# Altium PCB BMS042A_PCB.PcbDoc (part 1 of 5)
Units mil, origin at the board's own origin, x right, y up, seen from the top; angles counter-clockwise.
Board outline 4409.45 x 3307 mil, 6 copper layers (Top Layer, Layer 2 - PGND, Layer 3, Layer 4, Layer 5 - PGND, Bottom Layer), stack 60.8 mil thick; 273 components, 77 nets, 544 pads, 927 vias.
Unrouted connection lines stored in the file: 219.
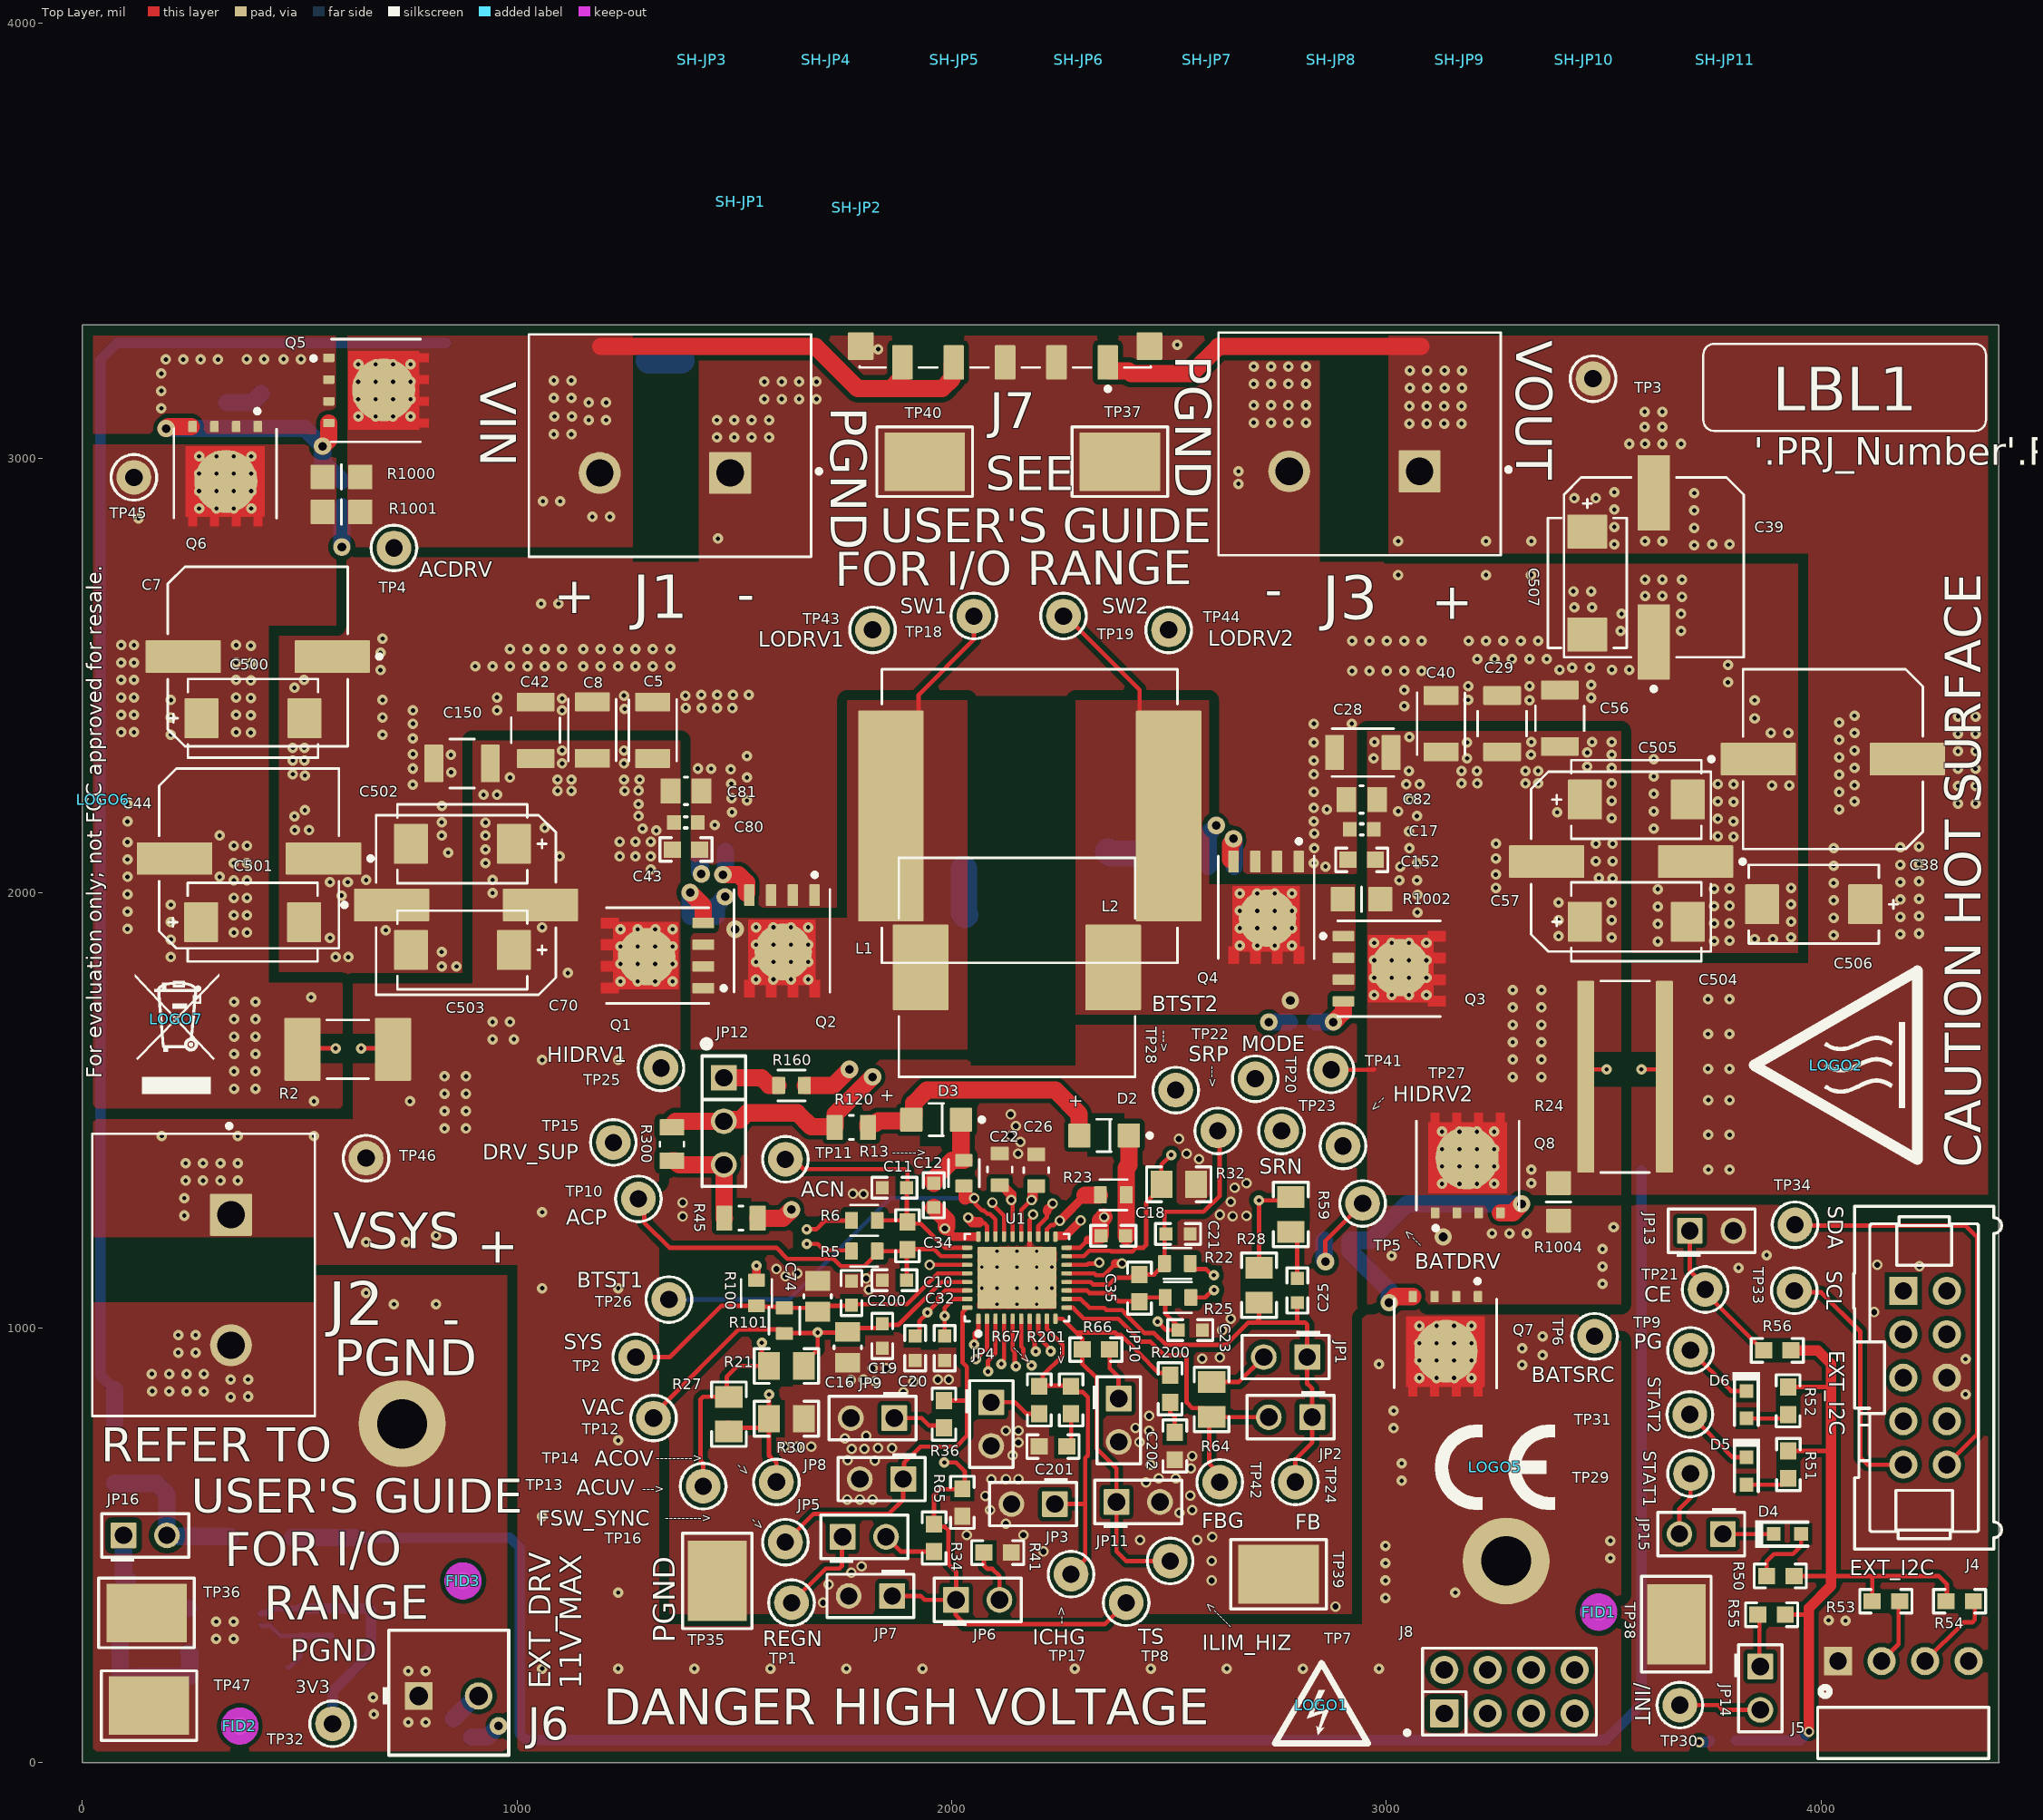
[diagram p0: Top Layer view]
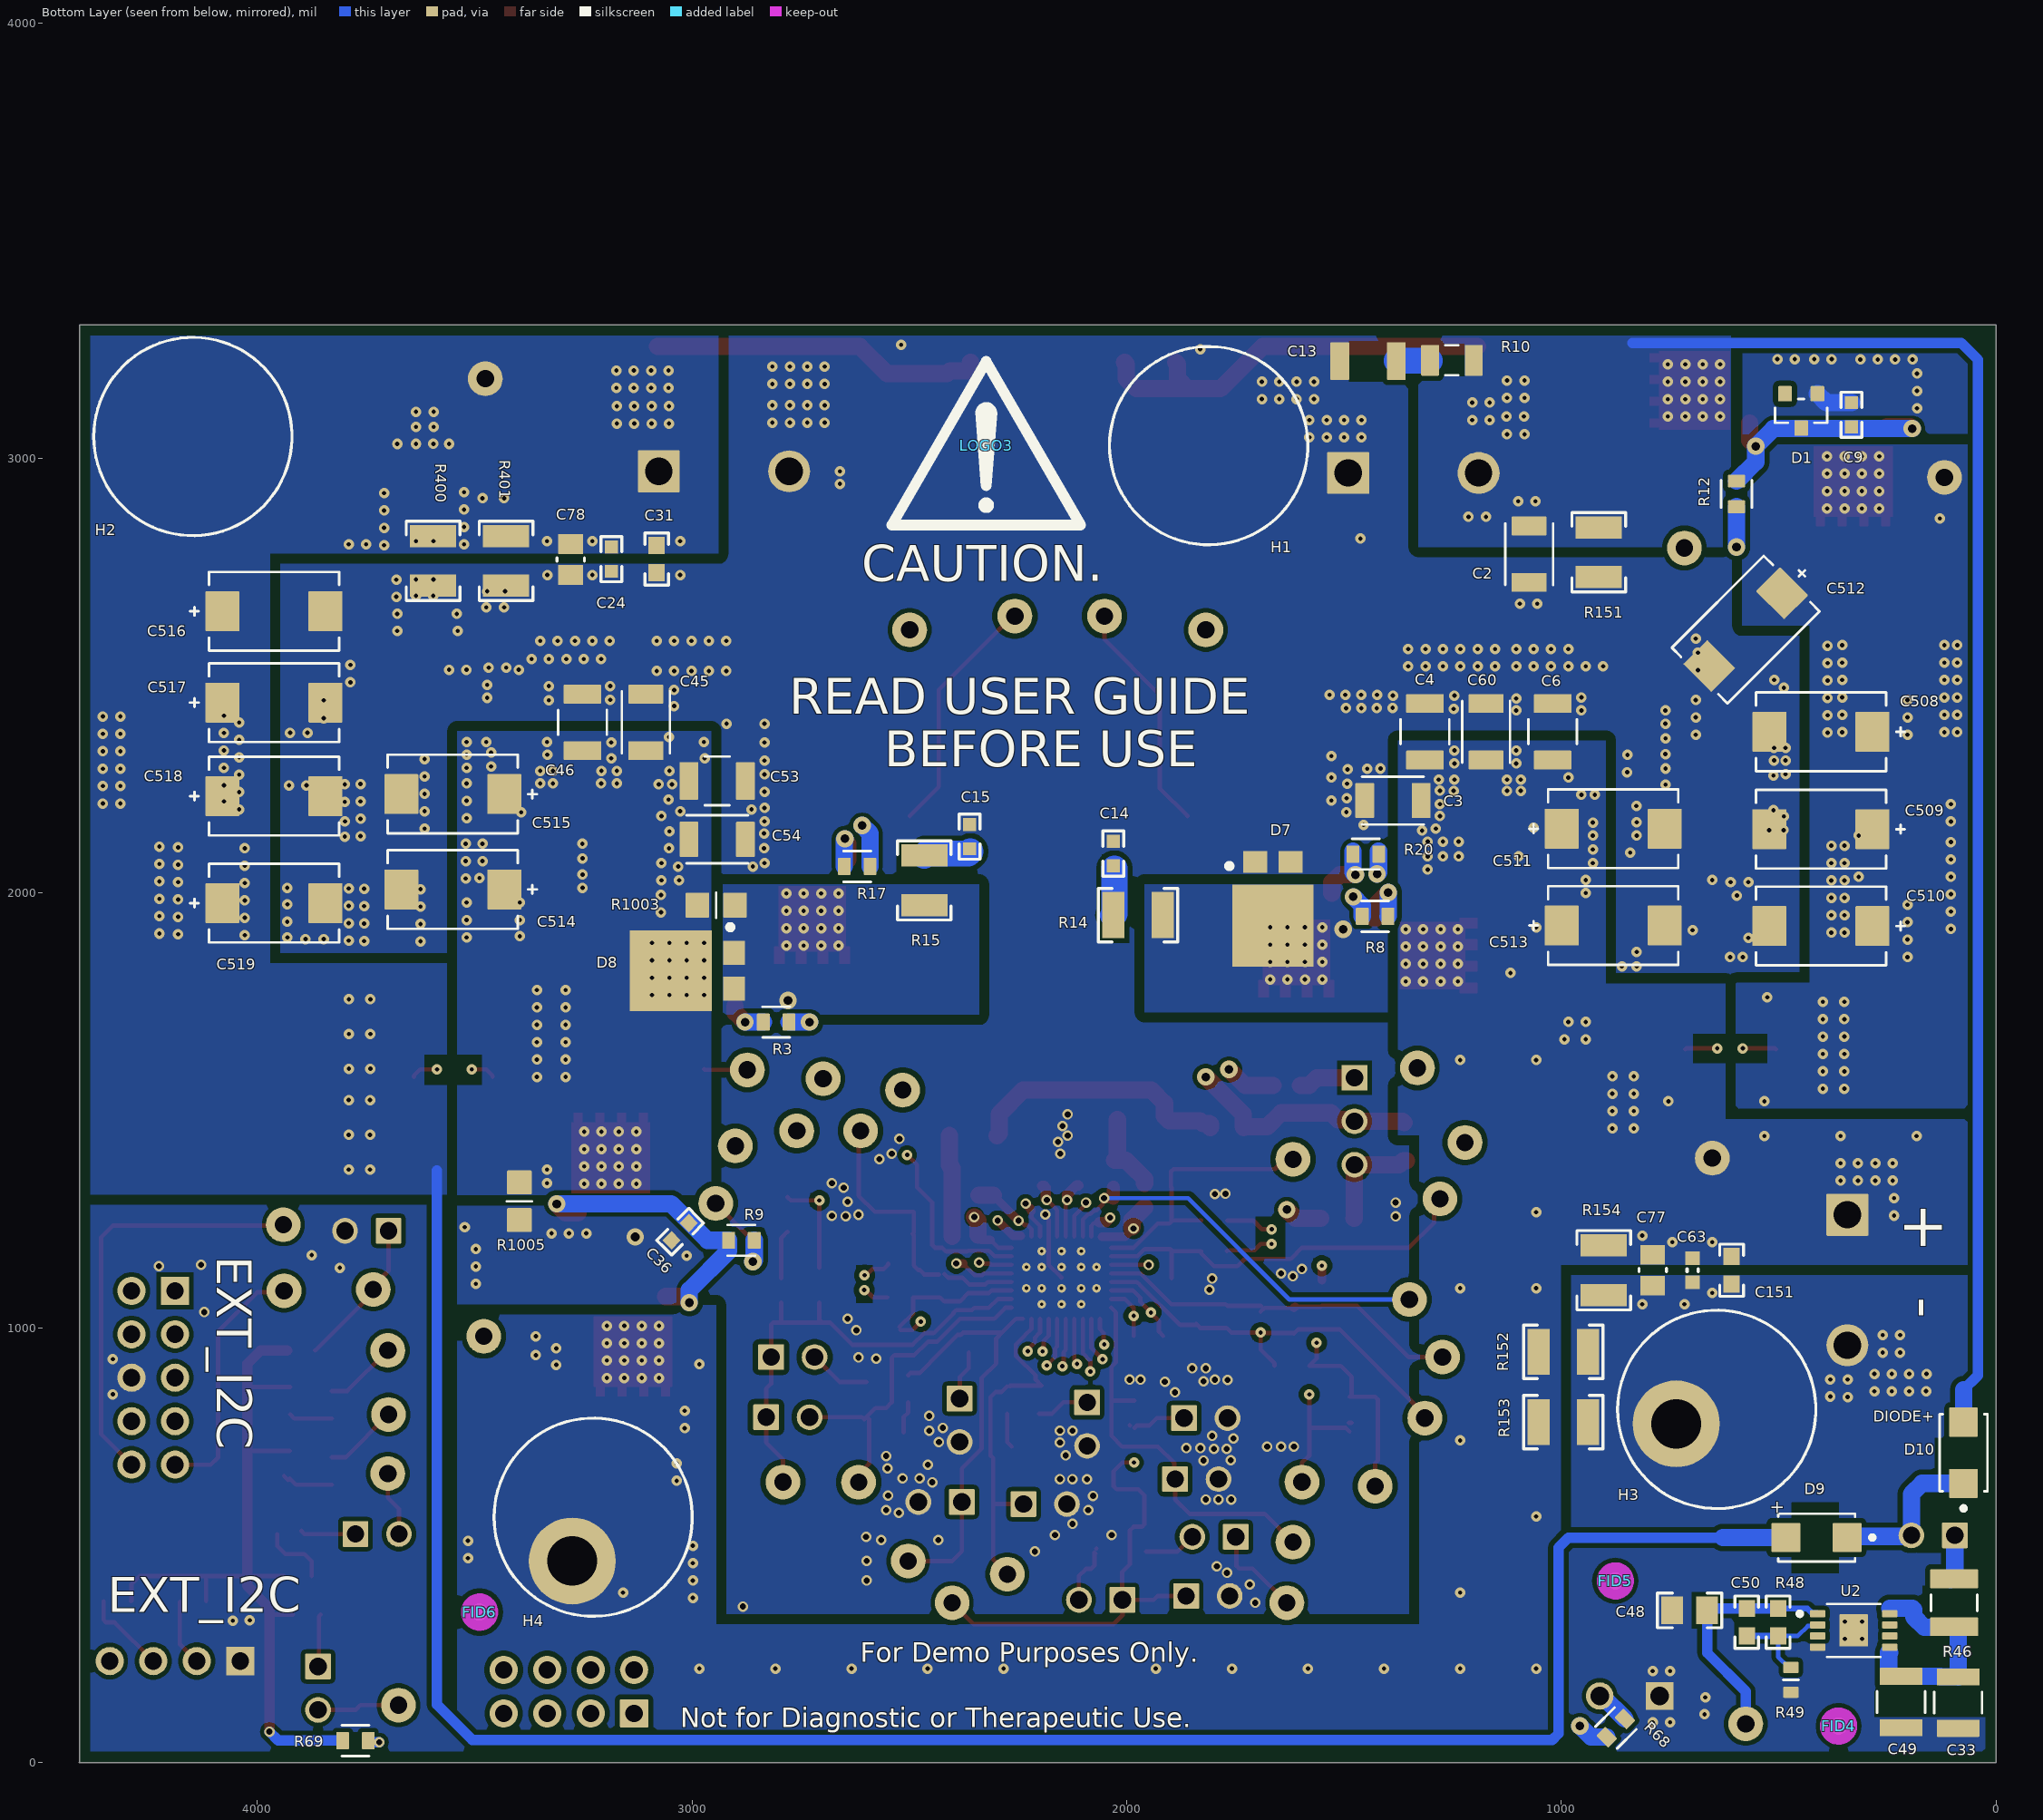
[diagram p1: Bottom Layer view, seen from below]
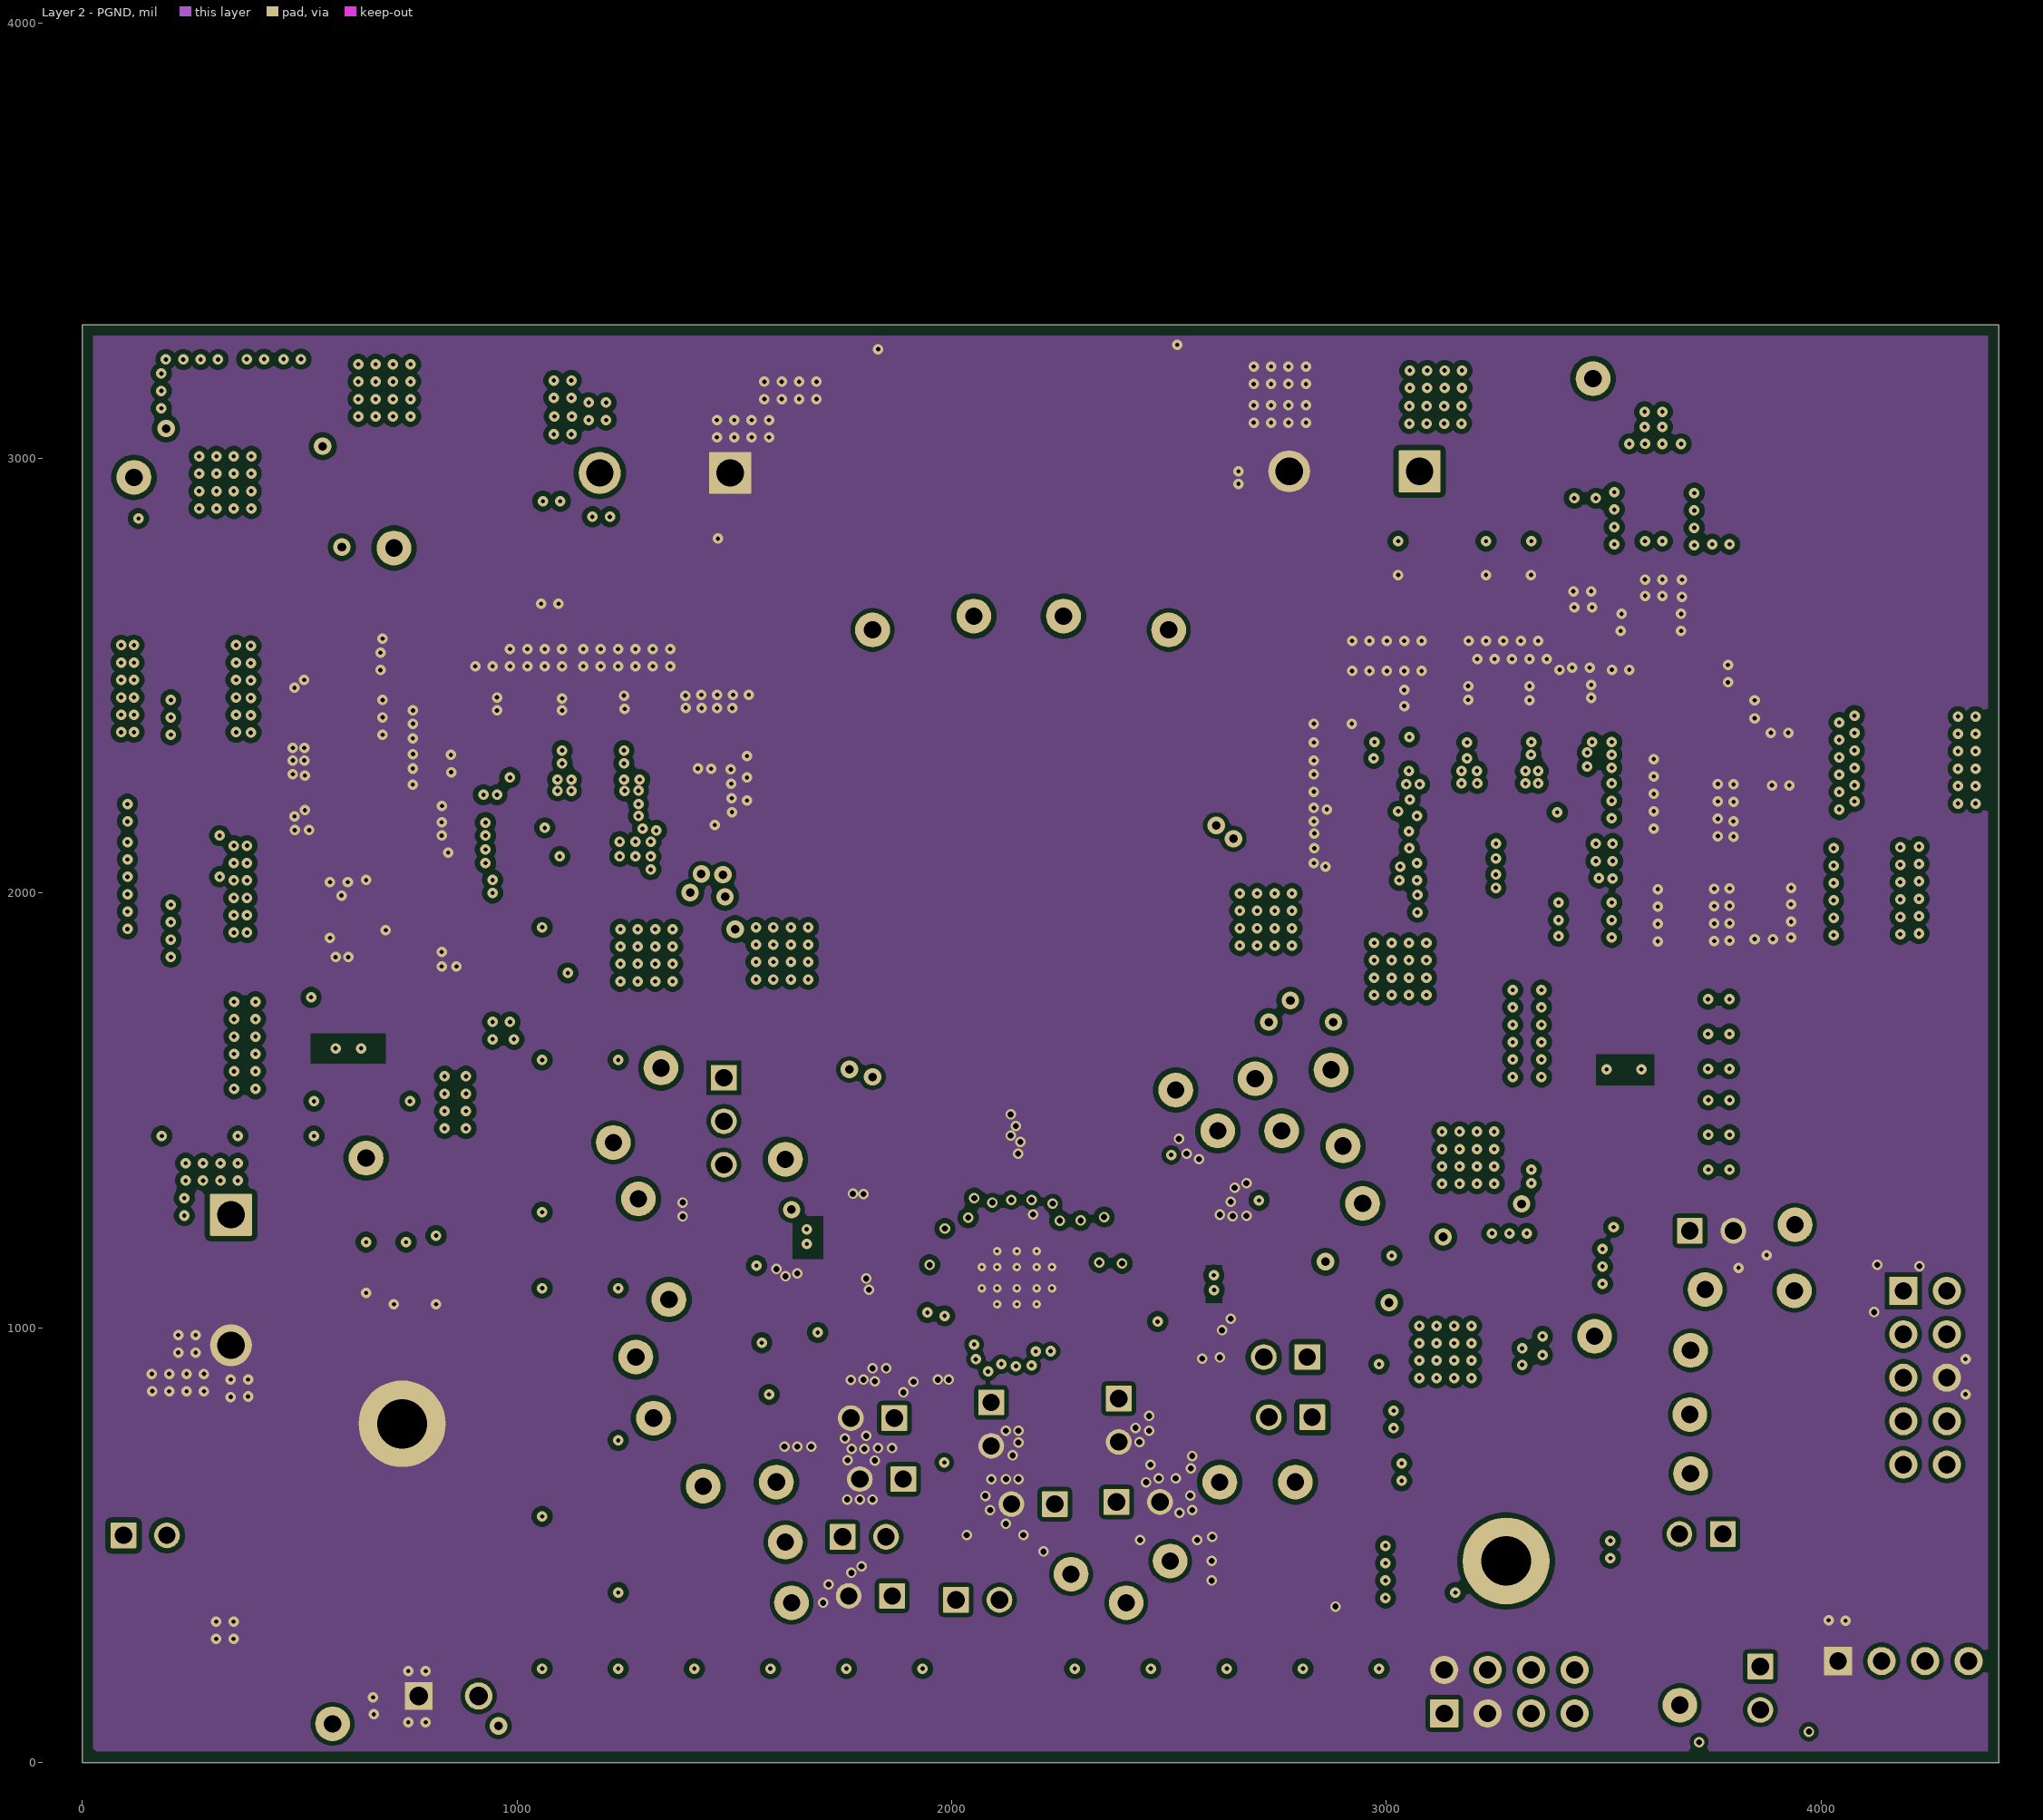
[diagram p2: Layer 2 - PGND]
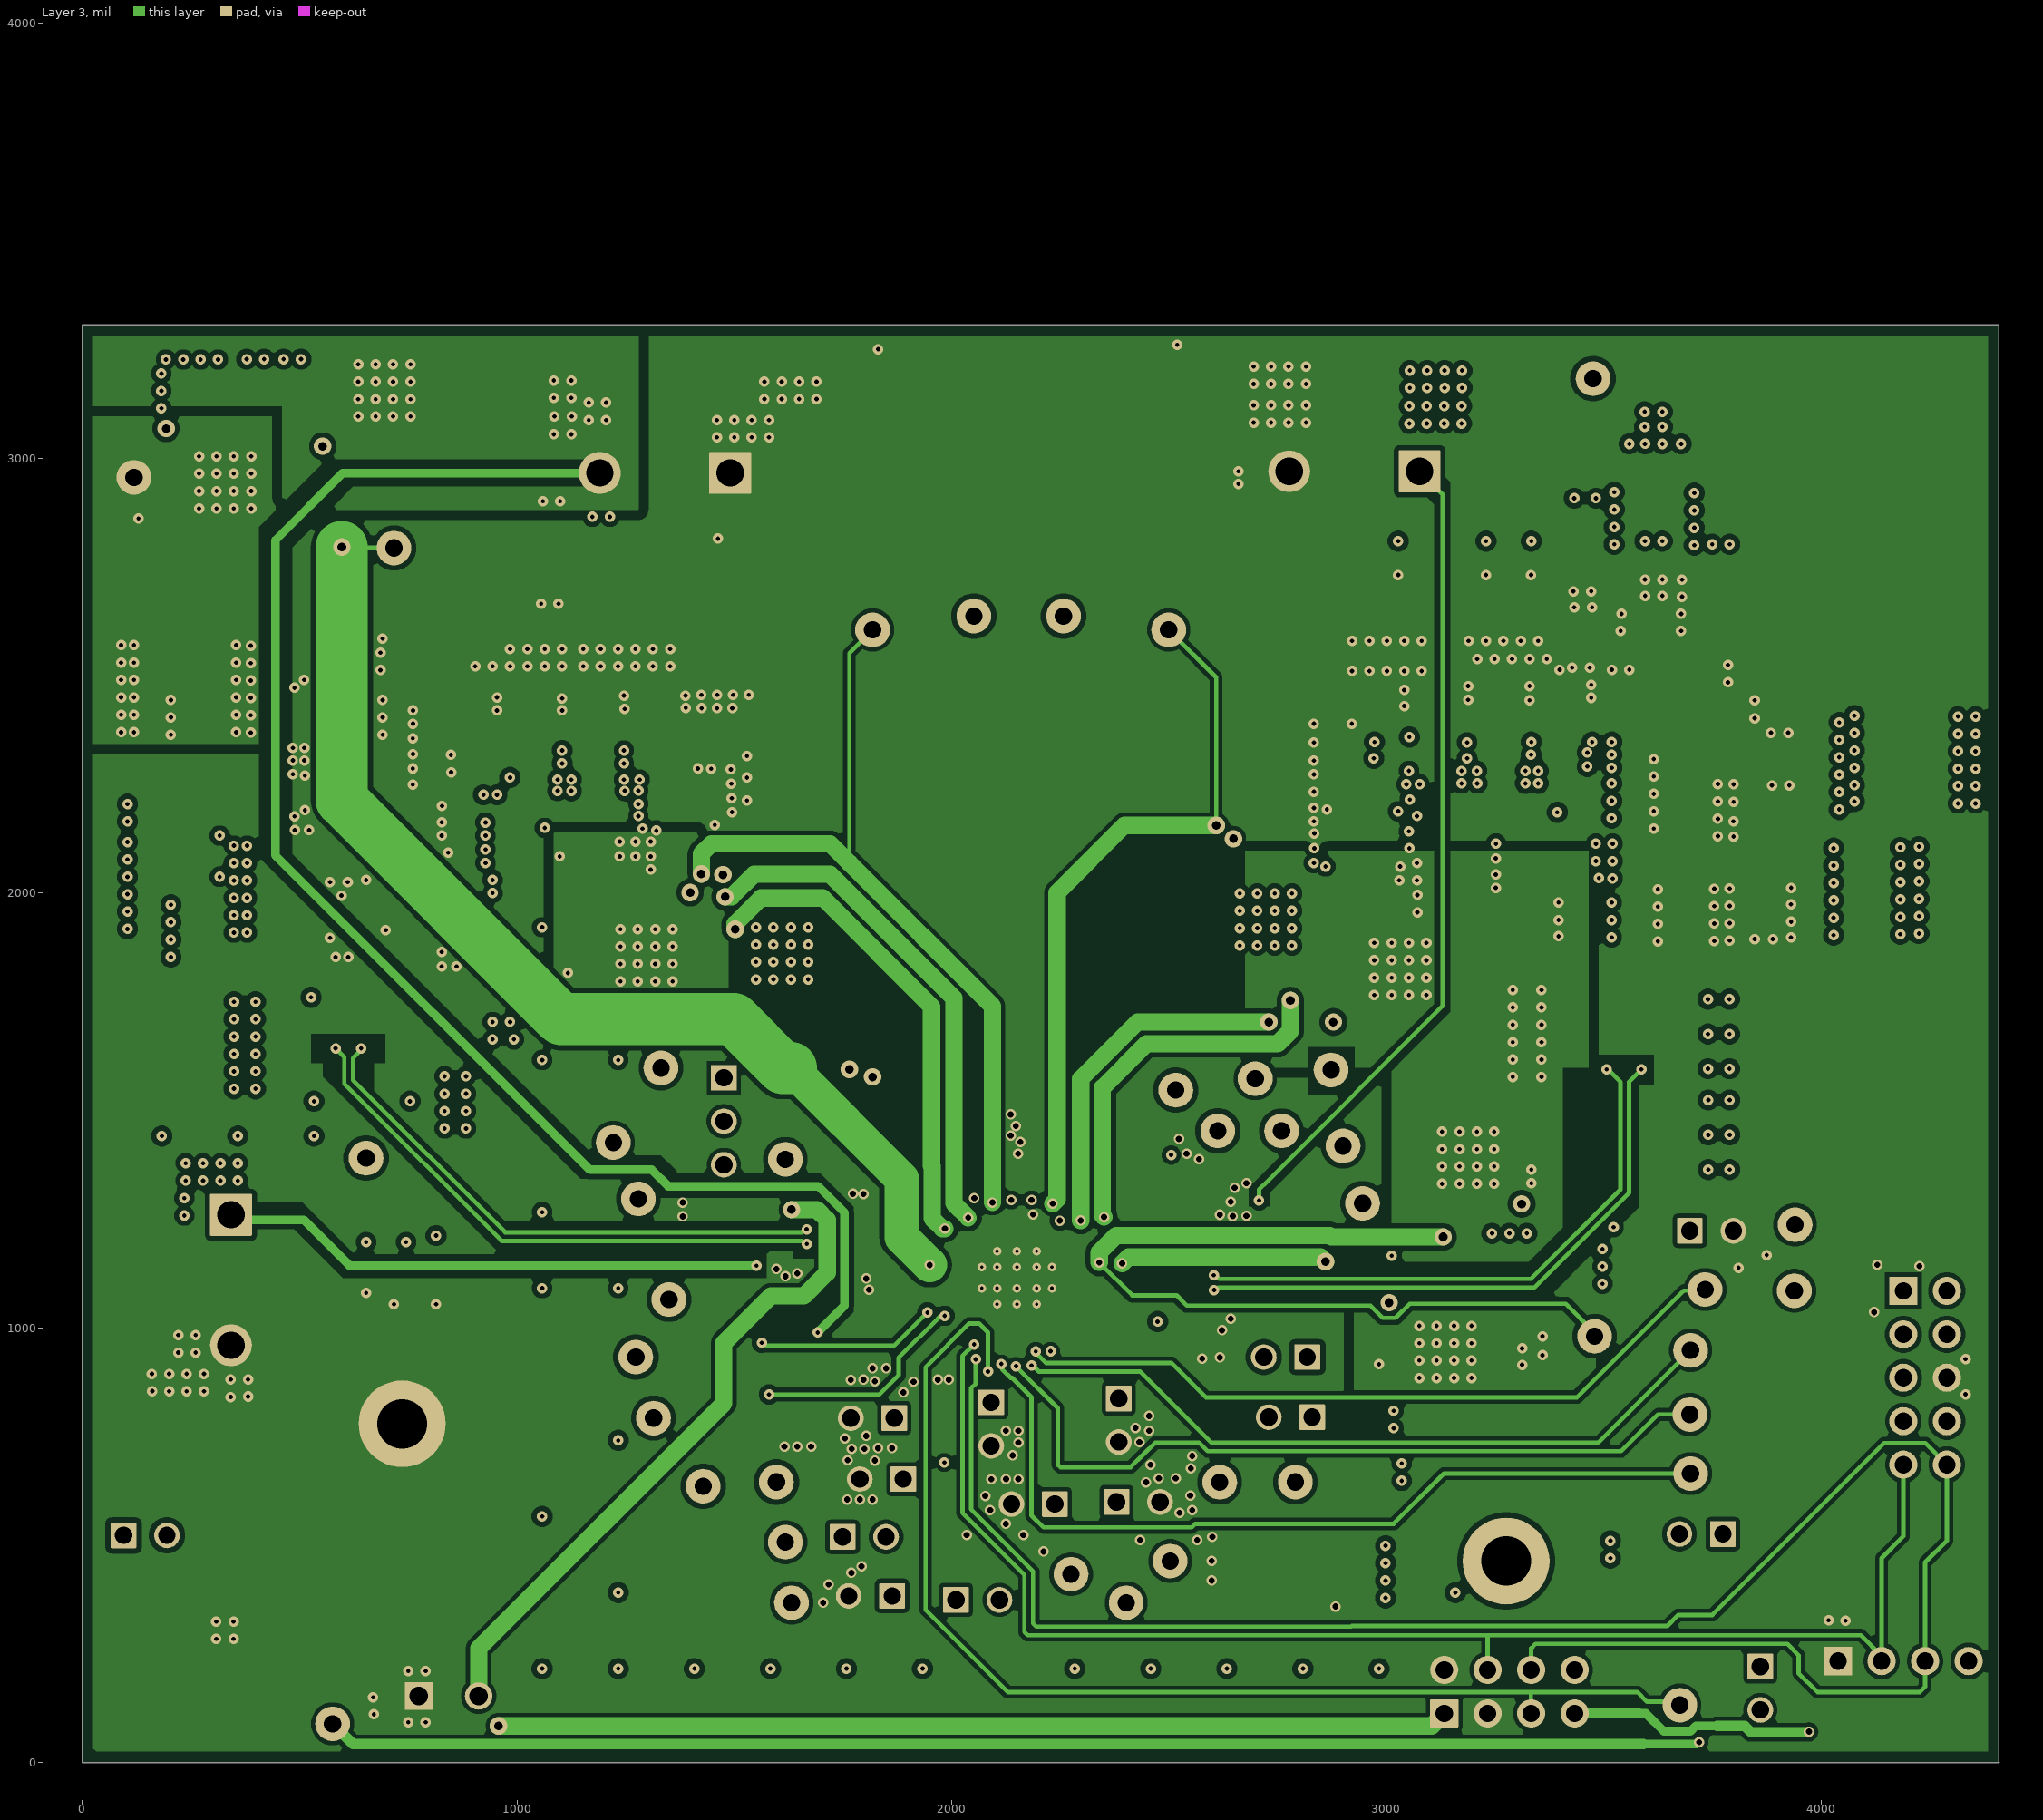
[diagram p3: Layer 3]
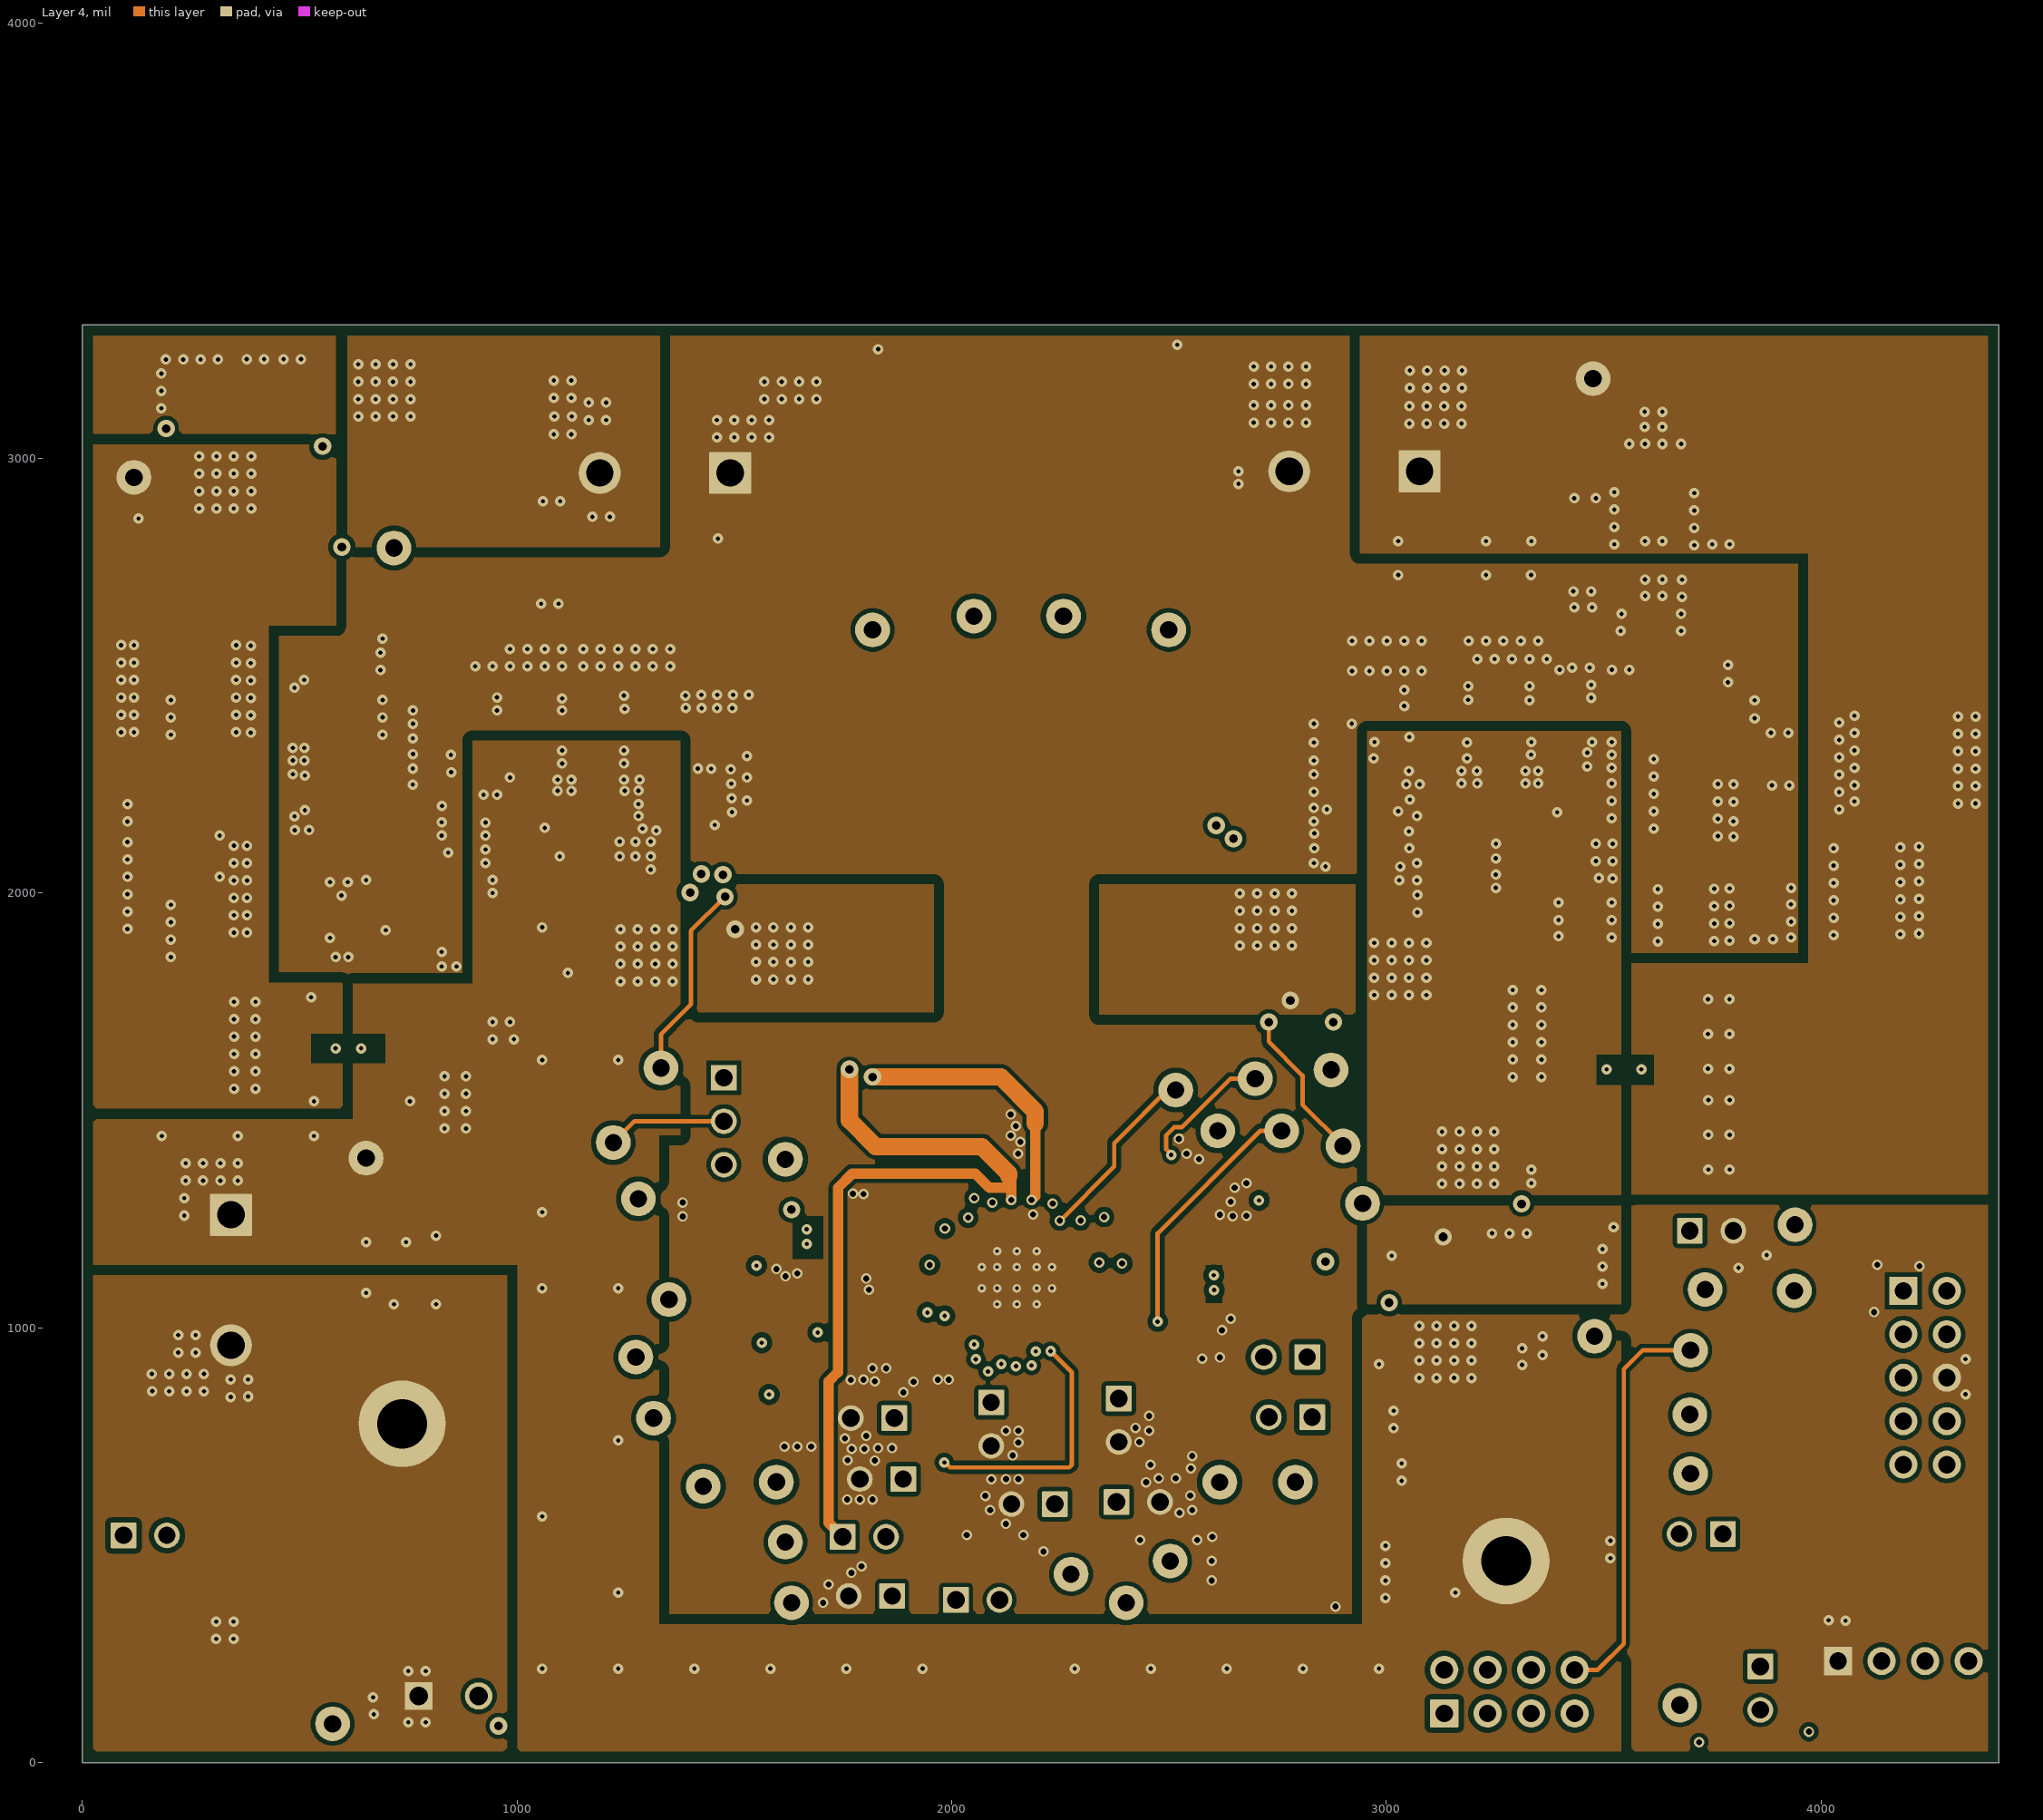
[diagram p4: Layer 4]
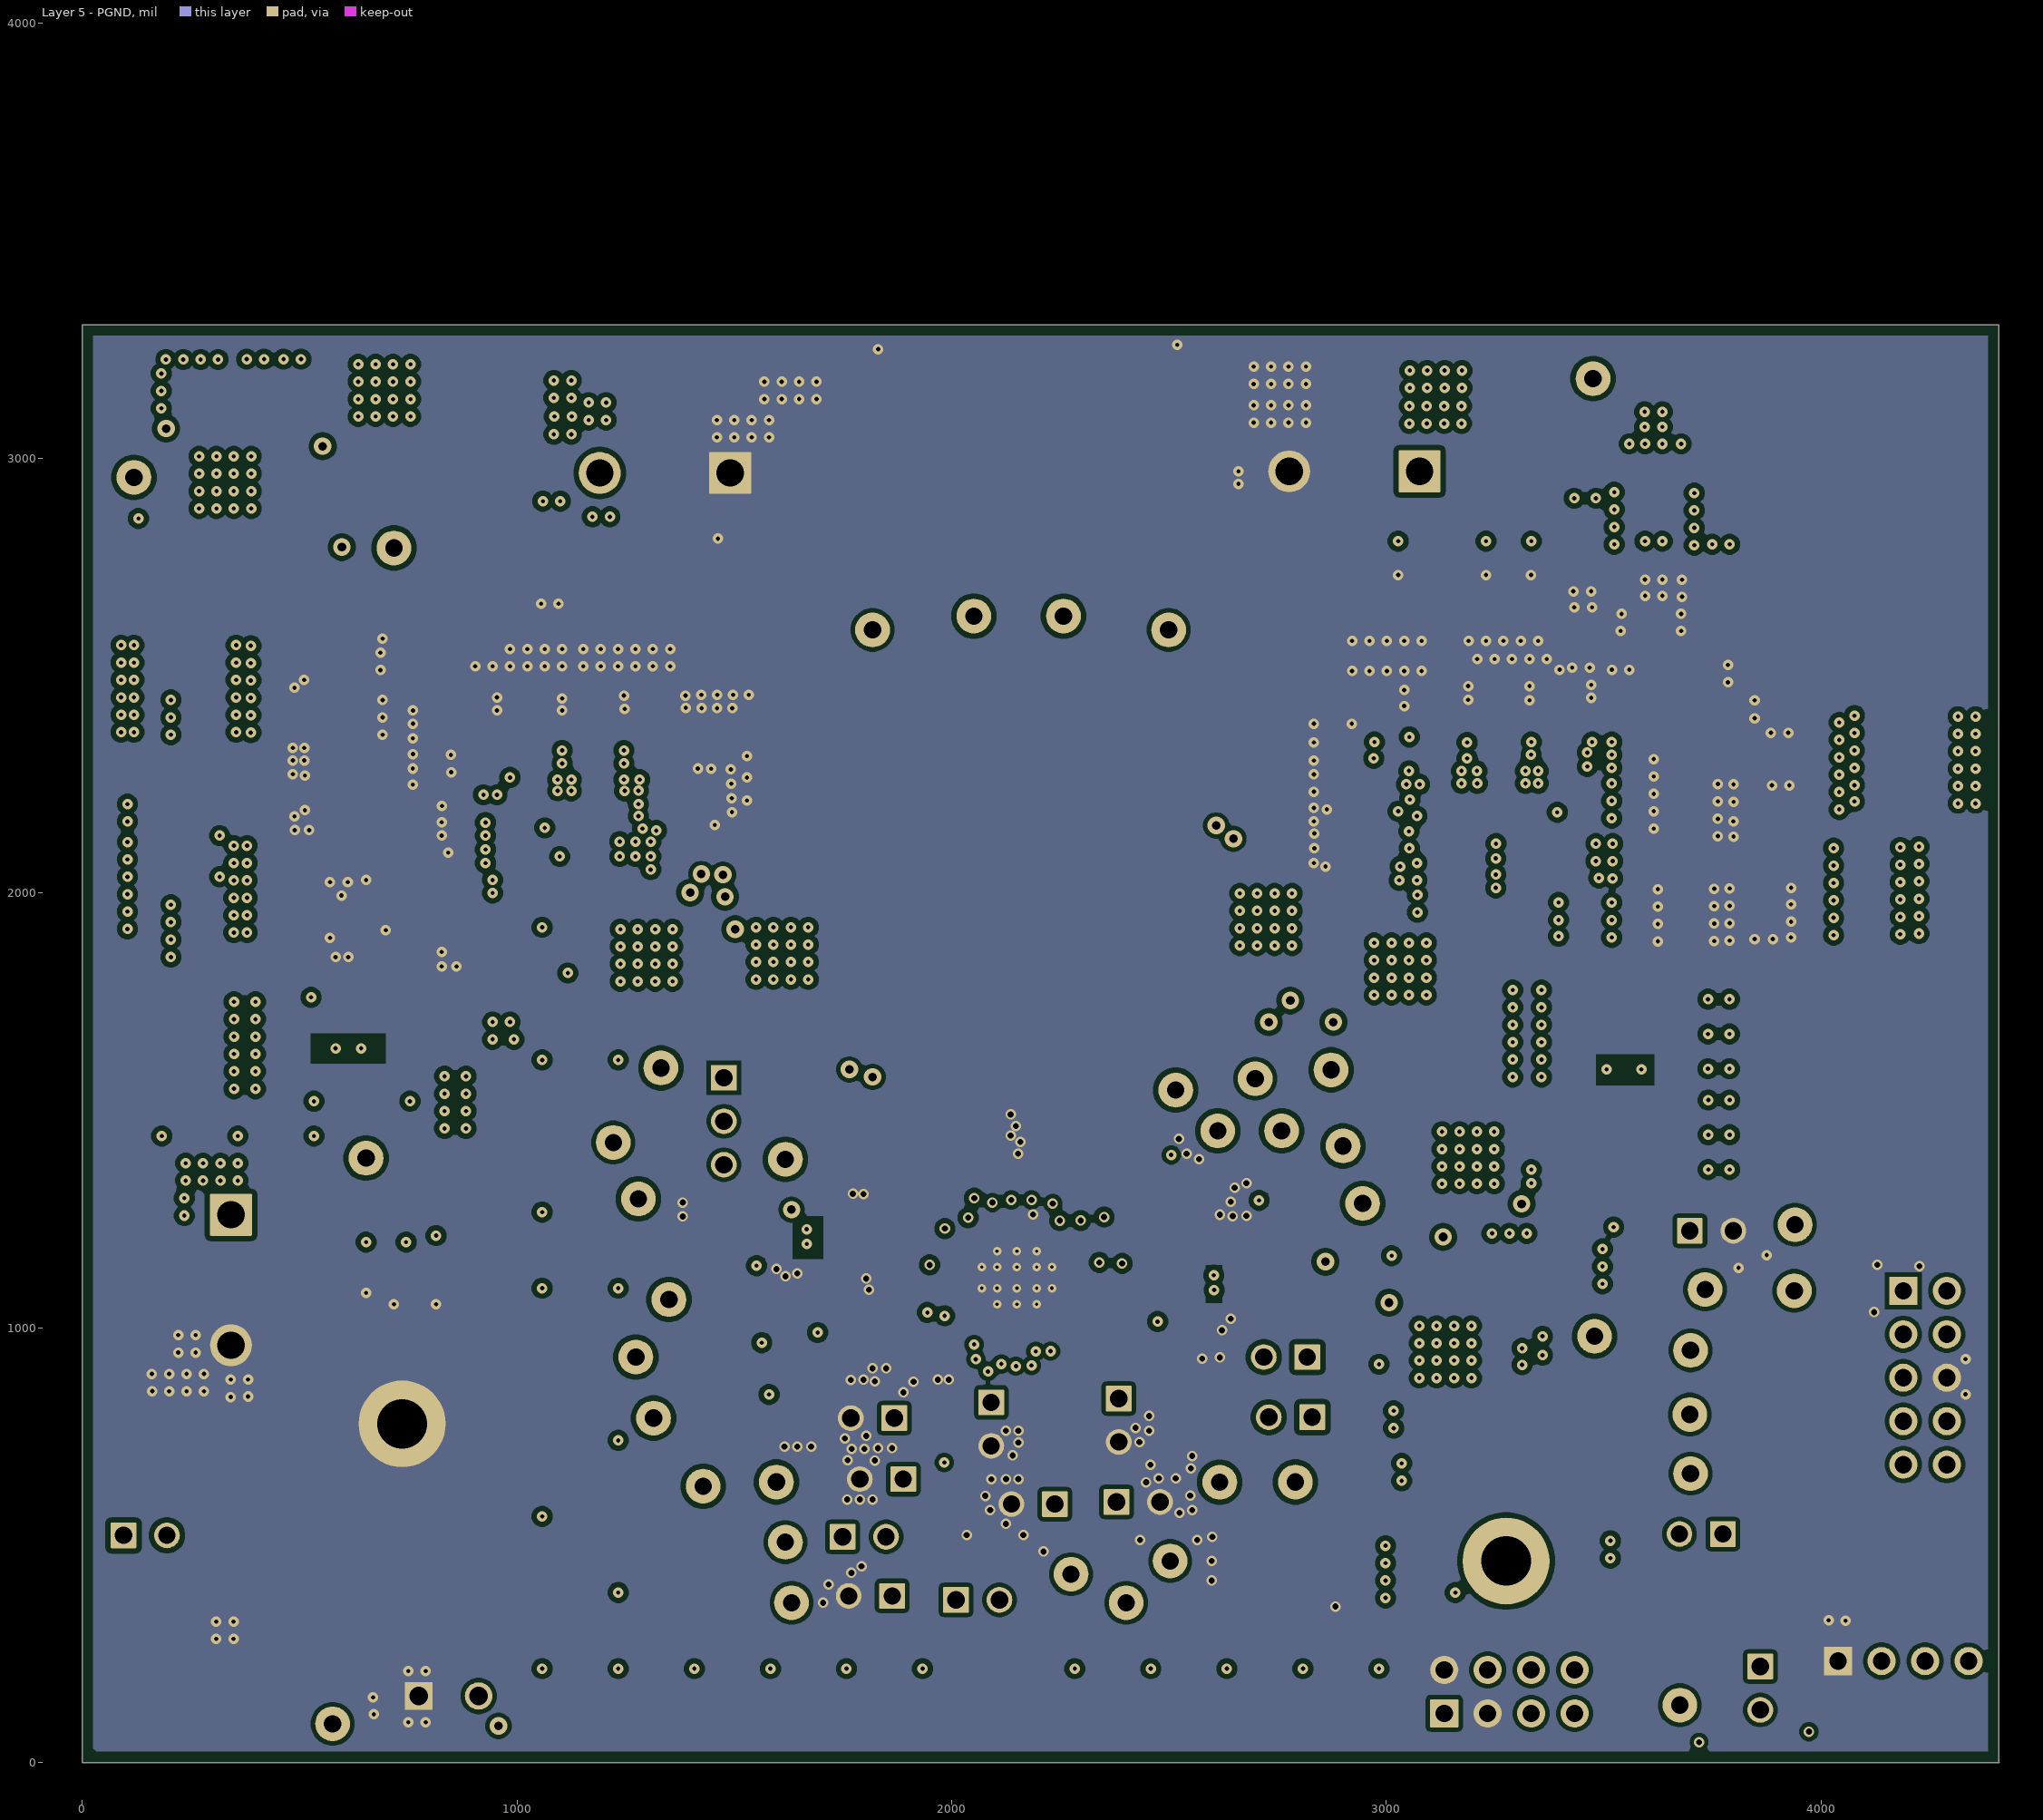
[diagram p5: Layer 5 - PGND]
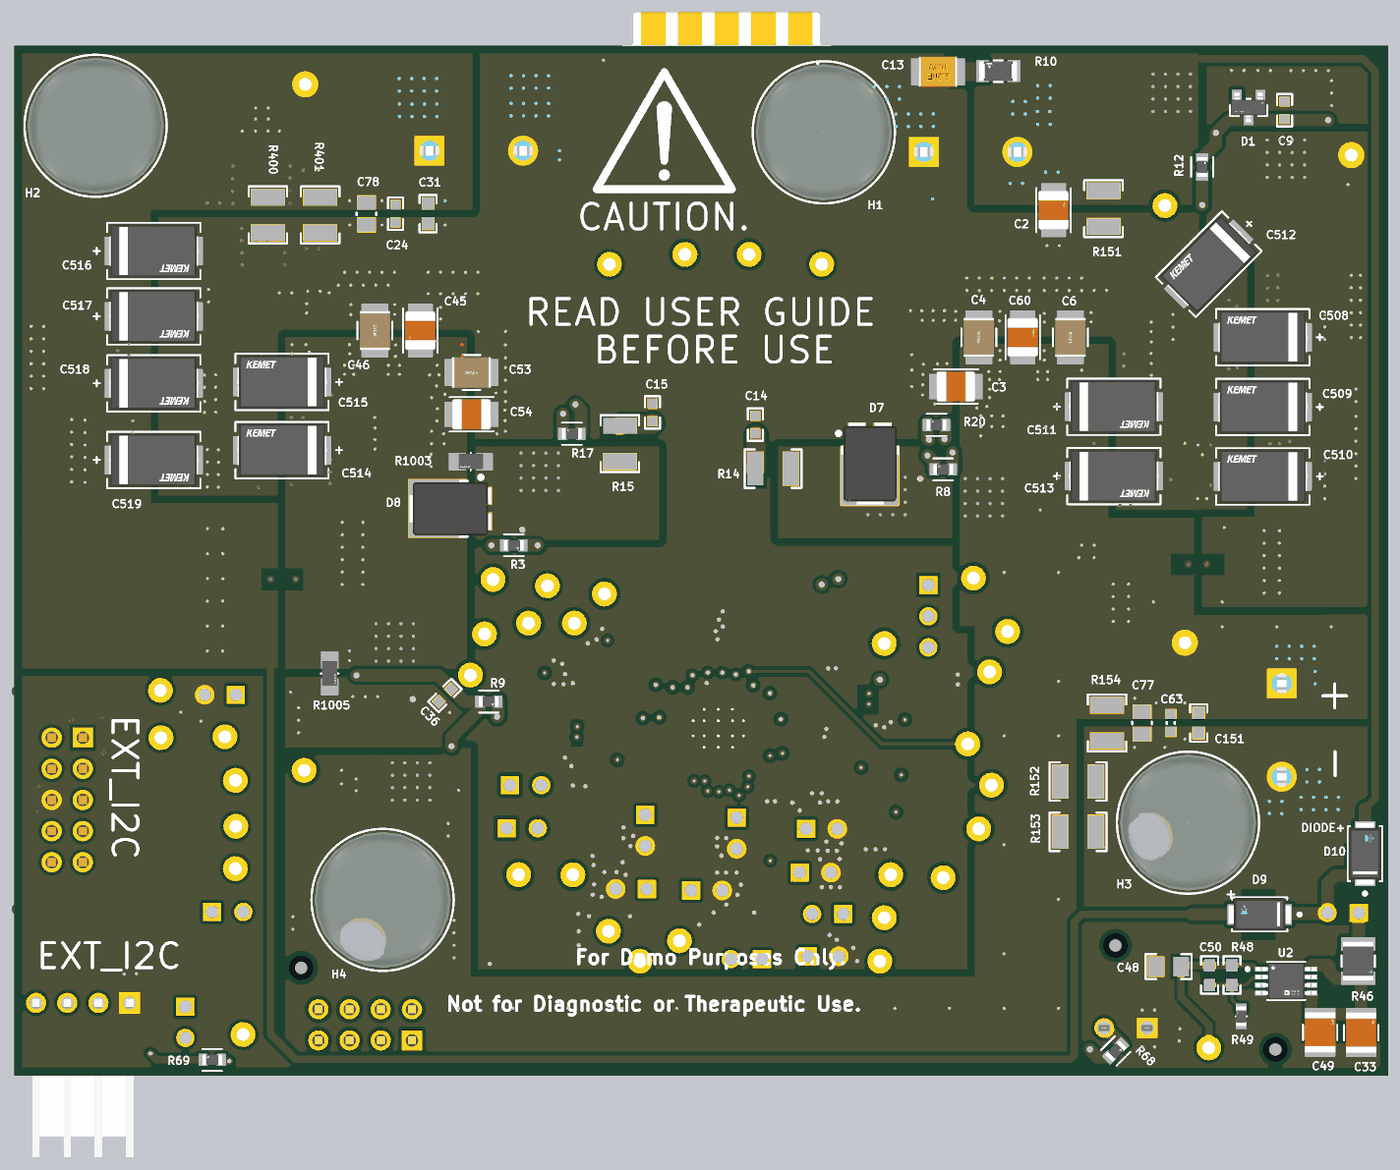
[diagram p8: 3D render of the assembled board from below, using the file's embedded part models]

## Layer stack, top to bottom
Top Solder: solder mask 0.6, Solder Resist, Dk 3.5
Top Layer: signal copper 2.8
Dielectric 1: prepreg 9, FR-4 High-Tg, Dk 4.2
Layer 2 - PGND: signal copper 2.8
Dielectric 2: core 10, FR-4 High-Tg, Dk 4.2
Layer 3: signal copper 2.8
Dielectric 4: prepreg 6, FR-4 High-Tg, Dk 4.2
Layer 4: signal copper 2.8
Dielectric 5: core 10, FR-4 High-Tg, Dk 4.2
Layer 5 - PGND: signal copper 2.8
Dielectric 3: prepreg 9, FR-4 High-Tg, Dk 4.2
Bottom Layer: signal copper 2.8
Bottom Solder: solder mask 0.6, Solder Resist, Dk 3.5

## Board outline
0,0 4409.45,0 4409,0.45 4409,3307 0,3307

## Design rules (kind name [scope] priority, off if disabled: settings)
AcuteAngle [All] p1: minimum=4.50000000000000E+0001 checktracksonly=FALSE
AssemblyTestPointUsage [All] p1: valid=2
BoardOutlineClearance BoardOutlineClearance_MountingHoles [OnCopper and InComponentClass('Mounting Holes')] p1: gap=10 ignorepadtopadclearanceinfootprint=FALSE
BoardOutlineClearance BoardOutlineClearance_Poly [OnCopper and IsPoly] p2: gap=25 ignorepadtopadclearanceinfootprint=FALSE
BoardOutlineClearance [OnCopper and Not InComponentClass('Logo') and not InComponentClass('FiducialMark') and not InRegion(1000,500,4000,800) and not InPoly] p3: gap=30 ignorepadtopadclearanceinfootprint=FALSE
Clearance Clearance_HV [InNetClass('HV') AND Inpolygon vs InPolygon] p1: gap=23.62 ignorepadtopadclearanceinfootprint=TRUE
Clearance Clearance_HV_GND [InNetClass('HV') vs InNet('PGND') OR InNet('AGND')] p2: gap=11.81 ignorepadtopadclearanceinfootprint=TRUE
Clearance Clearance_ACDRV [InNet('ACDRV') OR InNet('NetC9_2') vs InNet('NetC9_1')] p3: gap=9.84 ignorepadtopadclearanceinfootprint=TRUE
Clearance Clearance_BATDRV [InNet('BAT_DRV') OR InNet('NetC36_1') vs InNet('BAT_SRC')] p4: gap=9.84 ignorepadtopadclearanceinfootprint=TRUE
Clearance Clearance_LODRV1 [InNet('LODRV1') OR InNet('NetQ8_4') OR InNet('NetQ7_4') vs InNet('PGND') OR InNet('AGND')] p5: gap=9.84 ignorepadtopadclearanceinfootprint=TRUE
Clearance Clearance_HIDRV1 [InNet('HIDRV1') OR InNet('NetQ3_4') OR InNet('NetQ4_4') vs InNet('SW1')] p6: gap=9.84 ignorepadtopadclearanceinfootprint=TRUE
Clearance Clearance_LODRV2 [InNet('LODRV2') OR InNet('NetQ10_4') OR InNet('NetQ9_4') vs InNet('PGND') OR InNet('AGND')] p7: gap=9.84 ignorepadtopadclearanceinfootprint=TRUE
Clearance Clearance_HIDRV2 [InNet('HIDRV2') OR InNet('NetQ6_4') OR InNet('NetQ5_4') vs InNet('SW2')] p8: gap=9.84 ignorepadtopadclearanceinfootprint=TRUE
Clearance Clearance_HV_Trace_Polygon [All vs InNetClass('HV') AND Inpolygon] p9: gap=11.81 ignorepadtopadclearanceinfootprint=TRUE
Clearance Clearance_HV_NC [InNetClass('All Nets') vs InNet('NC')] p10: gap=23.62 ignorepadtopadclearanceinfootprint=TRUE
Clearance [All] p11: gap=9.84 ignorepadtopadclearanceinfootprint=TRUE
Clearance Clearance_Poly [InPolygon] p12: gap=9.84 ignorepadtopadclearanceinfootprint=TRUE
Clearance Clearance_Keepouts [((IsTrack Or IsArc) And Not InPoly) And IsFree and IsKeepOut vs ((IsTrack Or IsArc) And Not InPoly) And IsFree and IsKeepOut] p13: gap=9.84 ignorepadtopadclearanceinfootprint=FALSE
Clearance Clearance_FiducialMark [IsKeepOut and InComponentClass('FiducialMark') vs IsPad and InComponentClass('FiducialMark')] p14: gap=9.84 ignorepadtopadclearanceinfootprint=FALSE
ComponentClearance ComponentClearance_MountingHoles_FiducialMarks [InComponentClass('Mounting Holes') vs InComponentClass('FiducialMark')] p1: gap=50 collisioncheckmode=3 verticalgap=7.87 showdistances=FALSE
ComponentClearance ComponentClearance_Shunt [InComponentClass('Header') vs InComponentClass('Shunt')] p2: gap=7.87 collisioncheckmode=3 verticalgap=7.87 showdistances=FALSE
ComponentClearance ComponentClearance_Logo [InComponentClass('Logo')] p3: gap=50 collisioncheckmode=3 verticalgap=7.87 showdistances=FALSE
ComponentClearance ComponentClearance_ScrewToNut [(HasFootprint('NY PMS 440 0025 PH')) vs (HasFootprint('Keystone_1902C'))] p4: gap=5 collisioncheckmode=3 verticalgap=7.87 showdistances=FALSE
ComponentClearance ComponentClearance_MountingHoles [InComponentClass('Mounting Holes')] p5: gap=250 collisioncheckmode=3 verticalgap=100000 showdistances=FALSE
ComponentClearance ComponentClearance_SmallPassives [HasFootprint('0201*') or HasFootprint('0402*') or HasFootprint('0508') or HasFootprint('0603*') or HasFootprint('0612') or HasFootprint('0805*') or HasFootprint('0815*') or HasFootprint('0830*') or HasFootprint('1206*') or HasFootprint('1210*') or HasFootprint('1808*') or HasFootprint('1812*') or HasFootprint('1825*') or HasFootprint('2010*') or HasFootprint('2220*') or HasFootprint('2225*') or HasFootprint('2512*') or HasFootprint('2728*') or HasFootprint('3518*') vs HasFootprint('0201*') or HasFootprint('0402*') or HasFootprint('0508') or HasFootprint('0603*') or HasFootprint('0612') or HasFootprint('0805*') or HasFootprint('0815*') or HasFootprint('0830*') or HasFootprint('1206*') or HasFootprint('1210*') or HasFootprint('1808*') or HasFootprint('1812*') or HasFootprint('1825*') or HasFootprint('2010*') or HasFootprint('2220*') or HasFootprint('2225*') or HasFootprint('2512*') or HasFootprint('2728*') or HasFootprint('3518*')] p6: gap=7.87 collisioncheckmode=3 verticalgap=7.87 showdistances=FALSE
ComponentClearance ComponentClearance_THtoSMT [IsThruComponent vs IsSMTComponent] p7: gap=40 collisioncheckmode=3 verticalgap=30 showdistances=FALSE
ComponentClearance ComponentClearance_THtoTH [IsThruComponent vs IsThruComponent] p8: gap=30 collisioncheckmode=3 verticalgap=30 showdistances=FALSE
ComponentClearance ComponentClearance_Inductor [InComponent('L1') vs InComponent('L2')] p9: gap=0 collisioncheckmode=3 verticalgap=0 showdistances=FALSE
ComponentClearance ComponentClearance_buck_only_resistor [InComponent('R68') vs InComponent('Q5') OR InComponent('Q6')] p10: gap=10 collisioncheckmode=3 verticalgap=7.87 showdistances=FALSE
ComponentClearance [All] p11: gap=30 collisioncheckmode=3 verticalgap=7.87 showdistances=FALSE
DiffPairsRouting [All] p1: maxlimit=100 minlimit=10 mostfreqgap=10 toplayer_minwidth=15 toplayer_maxwidth=15 toplayer_prefwidth=15 midlayer1_minwidth=15 midlayer1_maxwidth=15 midlayer1_prefwidth=15 midlayer2_minwidth=15 midlayer2_maxwidth=15 midlayer2_prefwidth=15 midlayer3_minwidth=15 midlayer3_maxwidth=15 midlayer3_prefwidth=15 midlayer4_minwidth=15 midlayer4_maxwidth=15 midlayer4_prefwidth=15 bottomlayer_minwidth=15 bottomlayer_maxwidth=15 bottomlayer_prefwidth=15 maxuncoupledlength=1000
FabricationTestPointUsage TestPointUsage [All] p1: valid=2 allowmultiple=FALSE
FabricationTestpoint Testpoint [All] p1: side=3 testpointundercomponent=TRUE minsize=40 maxsize=100 preferedsize=60 minholesize=0 maxholesize=40 preferedholesize=32 testpointgrid=1 allowsidetop=TRUE allowsidebottom=TRUE usegrid=TRUE gridtolerance=0.01
FanoutControl Fanout_LCC [IsLCC] p1: bgadir=Out bgaviamode=Centered fanoutstyle=Auto fanoutdirection=Alternating viagrid=1 // Fanout_LCC (Default Rule)
FanoutControl Fanout_BGA [IsBGA] p2: bgadir=Out bgaviamode=Centered fanoutstyle=Auto fanoutdirection=Alternating viagrid=1 // Fanout_BGA (Default Rule)
FanoutControl Fanout_Default [All] p4: bgadir=Out bgaviamode=Centered fanoutstyle=Auto fanoutdirection=Alternating viagrid=1 // Fanout_Default (Default Rule)
FanoutControl Fanout_Small [(CompPinCount < 5)] p5: bgadir=Out bgaviamode=Centered fanoutstyle=Auto fanoutdirection=OutThenIn viagrid=1 // Fanout_Small (Default Rule)
HoleSize [All] p1: absolutevalues=TRUE maxlimit=251 minlimit=7.87 maxpercent=80.000 minpercent=20.000
MinimumAnnularRing MinimumAnnularRing_ThermalPadVias [IsVia and InAnyComponent] p1: minimumring=5.91
MinimumAnnularRing [All] p2: minimumring=4.9
MinimumSolderMaskSliver MinimumSolderMaskSliver_Logo [InComponentClass('Logo') vs InComponentClass('Logo')] p1: minsoldermaskwidth=0.7
MinimumSolderMaskSliver [All] p2: minsoldermaskwidth=3.94
PlaneConnect [All] p1: planeconnectstyle=Direct reliefexpansion=10 reliefentries=4 reliefconductorwidth=10 reliefairgap=10
PolygonConnect [All] p1: connectstyle=Direct reliefconductorwidth=10 reliefentries=4 polygonreliefangle="90 Angle" airgapwidth=10
RoutingVias ThermalPadVias [IsVia and InAnyComponent] p1: holewidth=7.87 width=19.68 viastyle="Through Hole" minholewidth=7.87 minwidth=19.68 maxholewidth=12.99 maxwidth=23.62
RoutingVias [All] p2: holewidth=16 width=34 viastyle="Through Hole" minholewidth=7.87 minwidth=20 maxholewidth=40 maxwidth=65
SilkToBoardRegionClearance [Not ((IsComment or IsDesignator) And (Hide <> 'False')) and not InRegion(1000,500,4000,800)] p1:
SilkToSilkClearance SilkToSilkClearance_Pb-FreeLogo [(HasFootprint('Pb-Free_Overlay_Medium') OR HasFootprint('Pb-Free_Overlay_Small')) vs (HasFootprint('Pb-Free_Overlay_Medium') OR HasFootprint('Pb-Free_Overlay_Small'))] p1: silktosilkclearance=0
SilkToSilkClearance [All] p2: silktosilkclearance=3.94
SilkToSolderMaskClearance SilkToComponentPadClearance [(IsPad or IsFill or IsRegion) and InAnycomponent] p1: minsilkscreentomaskgap=5 clearancetoexposedcopper=TRUE
SilkToSolderMaskClearance "Silk to Solder Mask Opening" [All] p2: minsilkscreentomaskgap=3.94 clearancetoexposedcopper=FALSE
SolderMaskExpansion SolderMaskExpansion_Via [IsVia] p1: expansion=1.97 istentingtop=TRUE
SolderMaskExpansion [All] p2: expansion=1.97 istentingtop=FALSE
UnRoutedNet [All] p1: checkbadconnections=TRUE
Width [All] p1: maxlimit=150 minlimit=9.84 preferedwidth=20 checkconnectedcopper=TRUE
14 further rules are at their usual default settings.

## Classes and differential pairs
component class powerpath_capacitors: C3 C4 C5 C6 C7 C8 C17 C24 C28 C29 C31 C38 C39 C40 C42 C43 C44 C45 C46 C53 C54 C56 C57 C60 C70 C78 C80 C81 C82 C150 C152 C500 C501 C502 C503 C504 C505 C506 C507 C508 C509 C510 C511 C512 C513 C514 C515 C516 C517 C518 C519 R152 R153 R154 R400 R401
component class FiducialMark: FID1 FID2 FID3 FID4 FID5 FID6
component class Shunt: SH-JP1 SH-JP2 SH-JP3 SH-JP4 SH-JP5 SH-JP6 SH-JP7 SH-JP8 SH-JP9 SH-JP10 SH-JP11
component class Label: LBL1
component class Header: J8 JP1 JP2 JP3 JP4 JP5 JP6 JP7 JP8 JP9 JP10 JP11 JP12 JP13 JP14 JP15 JP16
component class AssemblyNote: ZZ1 ZZ2 ZZ3 ZZ4 ZZ5 ZZ6 ZZ7
component class BMS042-E4_page2: C33 C48 C49 C50 C201 C202 D4 D5 D6 D9 D10 J4 J5 J6 J7 J8 JP3 JP4 JP5 JP6 JP7 JP8 JP9 JP10 JP11 JP12 JP13 JP14 JP15 JP16 R34 R36 R41 R45 R46 R48 R49 R50 R51 R52 R53 R54 R55 R56 R65 R66 R67 R68 R69 R160 R200 R201 R300 TP1 TP2 TP3 TP4 TP5 TP6 TP7 TP8 TP9 TP10 TP11 TP12 TP13 TP14 TP15 TP16 TP17 TP18 TP19 TP20 TP21 TP22 TP23 TP24 TP25 TP26 TP27 TP28 TP29 TP30 TP31 TP32 TP33 TP34 TP35 TP36 TP37 TP38 TP39 TP40 TP42 TP43 TP44 TP47 U2
component class BMS042-E4_page1: C2 C9 C10 C11 C12 C13 C14 C15 C16 C18 C19 C20 C21 C22 C23 C25 C26 C32 C34 C35 C36 C63 C74 C77 C151 C200 D1 D2 D3 D7 D8 J1 J2 J3 JP1 JP2 L1 L2 Q1 Q2 Q3 Q4 Q5 Q6 Q7 Q8 R2 R3 R5 R6 R8 R9 R10 R12 R13 R14 R15 R17 R20 R21 R22 R23 R24 R25 R27 R28 R30 R32 R59 R64 R100 R101 R120 R151 R1000 R1001 R1002 R1003 R1004 R1005 TP41 TP45 TP46 U1
component class BMS042-E4_Hardware: FID1 FID2 FID3 FID4 FID5 FID6 H1 H2 H3 H4 LBL1 LOGO1 LOGO2 LOGO3 LOGO5 LOGO6 LOGO7 PCB1 SH-JP1 SH-JP2 SH-JP3 SH-JP4 SH-JP5 SH-JP6 SH-JP7 SH-JP8 SH-JP9 SH-JP10 SH-JP11 ZZ1 ZZ2 ZZ3 ZZ4 ZZ5 ZZ6 ZZ7
net class HV: AC_OUT ACDRV ACN ACOV ACP ACUV BAT BAT_DRV BAT_SRC BTST1 BTST2 FB FBG HIDRV1 HIDRV2 NetC9_1 NetC9_2 NetC12_2 NetC13_1 NetC14_1 NetC15_1 NetC18_1 NetC25_1 NetC33_2 NetC36_1 NetD9_1 NetJP1_2 NetJP16_1 NetQ1_4 NetQ3_4 P_OUT SRN SRP SW1 SW2 SYS VAC VSYS

## Components (designator, comment, footprint, x,y, rotation, side; value= is the part's Value field where it differs from the comment)
C2 "GCJ32DC72A475KE01L" FP-GCJ32DC72A475KE01L_1210-MFG 1074.28,2779.32 r90 bottom value=4.7µF
C3 "GCJ32DC72A475KE01L" FP-GCJ32DC72A475KE01L_1210-MFG 1387.59,2212.75 r0 bottom value=4.7µF
C4 "C3225X7R2A106K250AC" FP-C3225X7R2A106K250AC_1210-MFG 1313.95,2370.88 r90 bottom value=10µF
C5 "GCJ32DC72A475KE01L" FP-GCJ32DC72A475KE01L_1210-MFG 1312.48,2374.29 r270 top value=4.7µF
C6 "C3225X7R2A106K250AC" FP-C3225X7R2A106K250AC_1210-MFG 1020.15,2370.88 r90 bottom value=10µF
C7 "80SXV47M" FP-100SXV22M_RADIAL-MFG 403.82,2543.91 r180 top value=47uF
C8 "GCJ32DC72A475KE01L" FP-GCJ32DC72A475KE01L_1210-MFG 1173.36,2374.7 r270 top value=4.7µF
C9 "C0603C102J5RACTU" 0603_HV 333,3100 r270 bottom value=1000pF
C10 "HMK107B7104KAHT" 0603_HV 1868.45,1109.45 r180 top value=0.1uF
C11 "HMK107B7104KAHT" 0603_HV 1868.45,1321.99 r180 top value=0.1uF
C12 "06033C104KAT2A" 0603_HV 1958.93,1304.66 r90 top value=0.1uF
C13 "CGA6N3X7R2A225K230AE" FP-CGA6N3X7R2A225K230AE_1210-MFG 1444.82,3223.42 r0 bottom
C14 "06031A330JAT2A" 0603_HV 2031.09,2090.58 r90 bottom value=33pF
C15 "06031A330JAT2A" 0603_HV 2361.12,2129.67 r90 bottom value=33pF
C16 "08051C105K4Z2A" 0805_150 1760.89,955.03 r270 top value=1uF
C17 "HMK107B7104KAHT" 0603L 2943.22,2146.28 r180 top value=0.1uF
C18 "06033C104KAT2A" 0603_HV 2371.89,1211.78 r180 top value=0.1uF
C19 "HMK107B7104KAHT" 0603_HV 1840.37,981.03 r270 top value=0.1uF
C20 "HMK107B7104KAHT" 0603_HV 1915.76,953.03 r270 top value=0.1uF
C21 "HMK107B7104KAHT" 0603_HV 2520.68,1216.07 r0 top value=0.1uF
C22 "CGA4J1X7R1E475K125AE" FP-CGA4J1X7R1E475K125AE_0805-MFG 2110.65,1364.21 r90 top value=4.7µF
C23 "HMK107B7104KAHT" 0603_HV 2548.68,994.76 r0 top value=0.1uF
C24 "HMK107B7104KAHT" 0603_HV 3185.59,2768 r270 bottom value=0.1uF
C25 "GCM1885C2A101JA16D" 0603_HV 2794.93,1085.69 r270 top value=100pF
C26 "CGA4J1X7R1E475K125AE" FP-CGA4J1X7R1E475K125AE_0805-MFG 2194.61,1362.47 r90 top value=4.7µF
C28 "GCJ32DC72A475KE01L" FP-GCJ32DC72A475KE01L_1210-MFG 2945.74,2323.27 r0 top value=4.7µF
C29 "C3225X7R2A106K250AC" FP-C3225X7R2A106K250AC_1210-MFG 3266.11,2389.53 r270 top value=10µF
C31 "CGA3E2X7R2A102K080AA" 0603 3081.1,2768 r270 bottom value=1000pF
C32 "HMK107B7104KAHT" 0603_HV 1983.89,953.03 r270 top value=0.1uF
C33 "12101C105KAT2A" FP-12101C105KAT2A_1210-MFG 87.51,137.9 r90 bottom value=1µF
C34 "C0603C474K4RACTU" 0603 1898.32,1211.54 r90 top value=0.47uF
C35 "C0603C474K4RACTU" 0603 2431.88,1091.03 r270 top value=0.47uF
C36 "C0603C102J5RACTU" 0603_HV 3027,1221 r315 bottom value=1000pF
C38 "80SXV47M" FP-100SXV22M_RADIAL-MFG 4027,2308 r0 top value=47uF
C39 "80SXV47M" FP-100SXV22M_RADIAL-MFG 3615,2749 r90 top value=47uF
C40 "GCJ32DC72A475KE01L" FP-GCJ32DC72A475KE01L_1210-MFG 3125.56,2389.53 r270 top value=4.7µF
C42 "C3225X7R2A106K250AC" FP-C3225X7R2A106K250AC_1210-MFG 1043,2374.29 r270 top value=10µF
C43 "CGA3E2C0G2A101J080AA" 0603 1388.68,2100 r0 top value=100pF
C44 "80SXV47M" FP-100SXV22M_RADIAL-MFG 383.73,2079.34 r180 top value=47uF
C45 "GCJ32DC72A475KE01L" FP-GCJ32DC72A475KE01L_1210-MFG 3106,2392.5 r270 bottom value=4.7µF
C46 "C3225X7R2A106K250AC" FP-C3225X7R2A106K250AC_1210-MFG 3251.73,2392.5 r270 bottom value=10µF
C48 "C0805C105K3RACTU" 0805_HV 705,350 r0 bottom value=1uF
C49 "12101C105KAT2A" FP-12101C105KAT2A_1210-MFG 218.68,139.07 r90 bottom value=1µF
C50 "C0603C221K5RACTU" 0603 573.69,322.88 r270 bottom value=220pF
C53 "C3225X7R2A106K250AC" FP-C3225X7R2A106K250AC_1210-MFG 2942,2257.82 r0 bottom value=10µF
C54 "GCJ32DC72A475KE01L" FP-GCJ32DC72A475KE01L_1210-MFG 2942,2123.5 r0 bottom value=4.7µF
C56 "C3225X7R2A106K250AC" FP-C3225X7R2A106K250AC_1210-MFG 3399,2402 r270 top value=10µF
C57 "80SXV47M" FP-100SXV22M_RADIAL-MFG 3539.82,2072.26 r180 top value=47uF
C60 "GCJ32DC72A475KE01L" FP-GCJ32DC72A475KE01L_1210-MFG 1173.21,2370.88 r90 bottom value=4.7µF
C63 "HMK107B7104KAHT" 0603L 698,1132.39 r270 bottom value=0.1uF
C70 "80SXV47M" FP-100SXV22M_RADIAL-MFG 882.81,1972.53 r0 top value=47uF
C74 "08051C105K4Z2A" 0805_150 1691.61,1072.49 r90 top value=1uF
C77 "08051C105K4Z2A" 0805_150 790.1,1132.39 r270 bottom value=1uF
C78 "08051C105K4Z2A" 0805_150 3279,2767 r270 bottom value=1uF
C80 "HMK107B7104KAHT" 0603L 1388.68,2162.53 r0 top value=0.1uF
C81 "08051C105K4Z2A" 0805_150 1388.68,2235 r0 top value=1uF
C82 "08051C105K4Z2A" 0805_150 2943.22,2214.91 r180 top value=1uF
C150 "C3225X7R2A106K250AC" FP-C3225X7R2A106K250AC_1210-MFG 873.79,2297.91 r0 top value=10µF
C151 "CGA3E2X7R2A102K080AA" 0603 608.58,1132.39 r270 bottom value=1000pF
C152 "CGA3E2C0G2A101J080AA" 0603 2943.22,2076.37 r180 top value=100pF
C200 "HMK107B7104KAHT" 0603_HV 1769.58,1079.68 r90 top value=0.1uF
C201 "C0603C104K8RACTU" 0603 2233.04,726.76 r180 top value=0.1uF
C202 "C0603C104K8RACTU" 0603 2513.26,727.97 r270 top value=0.1uF
C500 "T521X156M075ATE035" FP-T521X156M075ATE035_2917-MFG 392.82,2401.91 r180 top value=15µF
C501 "T521X156M075ATE035" FP-T521X156M075ATE035_2917-MFG 392,1933 r180 top value=15µF
C502 "T521X156M075ATE035" FP-T521X156M075ATE035_2917-MFG 874.47,2113.16 r0 top value=15µF
C503 "T521X156M075ATE035" FP-T521X156M075ATE035_2917-MFG 874.47,1868.99 r0 top value=15µF
C504 "T521X156M075ATE035" FP-T521X156M075ATE035_2917-MFG 3574.82,1933.91 r180 top value=15µF
C505 "T521X156M075ATE035" FP-T521X156M075ATE035_2917-MFG 3574.82,2214.91 r180 top value=15µF
C506 "T521X156M075ATE035" FP-T521X156M075ATE035_2917-MFG 3983,1974 r0 top value=15µF
C507 "T521X156M075ATE035" FP-T521X156M075ATE035_2917-MFG 3462,2713 r90 top value=15µF
C508 "T521X156M075ATE035" FP-T521X156M075ATE035_2917-MFG 402.98,2370.88 r180 bottom value=15µF
C509 "T521X156M075ATE035" FP-T521X156M075ATE035_2917-MFG 402.98,2146.89 r180 bottom value=15µF
C510 "T521X156M075ATE035" FP-T521X156M075ATE035_2917-MFG 402.98,1924.01 r180 bottom value=15µF
C511 "T521X156M075ATE035" FP-T521X156M075ATE035_2917-MFG 880.82,2147.87 r0 bottom value=15µF
C512 "T521X156M075ATE035" FP-T521X156M075ATE035_2917-MFG 576.2,2605.89 r135 bottom value=15µF
C513 "T521X156M075ATE035" FP-T521X156M075ATE035_2917-MFG 880.82,1925.2 r0 bottom value=15µF
C514 "T521X156M075ATE035" FP-T521X156M075ATE035_2917-MFG 3550,2008.25 r180 bottom value=15µF
C515 "T521X156M075ATE035" FP-T521X156M075ATE035_2917-MFG 3550,2227.52 r180 bottom value=15µF
C516 "T521X156M075ATE035" FP-T521X156M075ATE035_2917-MFG 3961.42,2648 r0 bottom value=15µF
C517 "T521X156M075ATE035" FP-T521X156M075ATE035_2917-MFG 3961.42,2438 r0 bottom value=15µF
C518 "T521X156M075ATE035" FP-T521X156M075ATE035_2917-MFG 3961.42,2222.91 r0 bottom value=15µF
C519 "T521X156M075ATE035" FP-T521X156M075ATE035_2917-MFG 3961.42,1976.79 r0 bottom value=15µF
D1 "SZBZX84C15LT3G" FP-SZBZX84C15LT3G_SOT23-MFG 448.49,3108.94 r270 bottom
D2 "V1FM10-M3/H" FP-V1FM10-M3-H_DO-219AB-MFG 2350.51,1442.17 r0 top
D3 "V1FM10-M3/H" FP-V1FM10-M3-H_DO-219AB-MFG 1964.28,1478.65 r0 top
D4 "150060VS75000" WL-SMCW_GREEN 3922.4,525.56 r0 top value=Green
D5 "150060VS75000" WL-SMCW_GREEN 3828,670.5 r270 top value=Green
D6 "150060VS75000" WL-SMCW_GREEN 3828,823 r270 top value=Green
D7 "FSV12100V" TO-277A 1663.62,1999.08 r180 bottom value=100V
D8 "FSV12100V" TO-277A 2974.89,1821 r270 bottom value=100V
D9 "VS-1EMH01HM3/5AT" FP-VS-1EMH01HM3_5AT_DO-214AC-MFG 412.97,517.5 r0 bottom
D10 "VS-1EMH01HM3/5AT" FP-VS-1EMH01HM3_5AT_DO-214AC-MFG 75,712.5 r90 bottom
FID1 "Fiducial" Fiducial10-20 3488.61,346.02 r0 top
FID2 "Fiducial" Fiducial10-20 362.48,83.87 r90 top
FID3 "Fiducial" Fiducial10-20 876.02,417.81 r90 top
FID4 "Fiducial" Fiducial10-20 362.48,83.87 r90 bottom
FID5 "Fiducial" Fiducial10-20 876.02,417.81 r90 bottom
FID6 "Fiducial" Fiducial10-20 3488.61,346.02 r90 bottom
H1 "SJ-5303 (CLEAR)" Bumpon_SJ5003Transparent 1811.44,3029.05 r180 bottom
H2 "SJ-5303 (CLEAR)" Bumpon_SJ5003Transparent 4148,3050 r180 bottom
H3 "SJ-5303 (CLEAR)" Bumpon_SJ5003Transparent 642.73,812.24 r180 bottom
H4 "SJ-5303 (CLEAR)" Bumpon_SJ5003Transparent 3227.17,564.24 r180 bottom
J1 "TB005-762-02BE" FP-TB005-762-02BE_TERM_CONN-MFG 1352.23,3029.05 r180 top
J2 "TB005-762-02BE" FP-TB005-762-02BE_TERM_CONN-MFG 279.14,1121.59 r270 top
J3 "TB005-762-02BE" FP-TB005-762-02BE_TERM_CONN-MFG 2938.23,3033.05 r180 top
J4 "N2510-6002-RB" CONN_2510-6002 4239,885.1 r270 top
J5 "0022053041" CONN_22-05-3041 4189,9 r0 top
J6 "0393570002" MOLEX_39357-0002 843,153 r0 top
J7 "109159005101916" FP-109159005101916_CONN_SSL_PLUG5-MFG 2122.91,3311.08 r0 top
J8 "TSW-104-07-G-D" TSW-104-07-G-D 3283,163 r0 top
JP1 "PEC02SAAN" CONN_PEC02SAAN 2767.87,932.59 r180 top
JP2 "PEC02SAAN" CONN_PEC02SAAN 2779.35,794.25 r180 top
JP3 "Header_2x1" CONN_PEC02SAAN 2187.34,594.5 r180 top
JP4 "Header_2x1" CONN_PEC02SAAN 2090.97,778.29 r270 top
JP5 "Header_2x1" CONN_PEC02SAAN 1799.03,519.15 r0 top
JP6 "Header_2x1" CONN_PEC02SAAN 2059.85,374.06 r0 top
JP7 "Header_2x1" CONN_PEC02SAAN 1813.1,383.15 r180 top
JP8 "Header_2x1" CONN_PEC02SAAN 1838.66,651.96 r180 top
JP9 "Header_2x1" CONN_PEC02SAAN 1818,792.25 r180 top
JP10 "Header_2x1" CONN_PEC02SAAN 2384.34,787.31 r270 top
JP11 "Header_2x1" CONN_PEC02SAAN 2429.24,599.34 r0 top
JP12 "PEC03SAAN" CONN_PEC03SAAN 1476,1475 r270 top
JP13 "PEC02SAAN" CONN_PEC02SAAN 3748,1223 r0 top
JP14 "PEC02SAAN" CONN_PEC02SAAN 3860,171 r270 top
JP15 "PEC02SAAN" CONN_PEC02SAAN 3724,525.56 r180 top
JP16 "Header_2x1" CONN_PEC02SAAN 145,522.5 r0 top
L1 "IHLP6767GZER100M01" FP-IHLP6767GZER100M01_SMT_INDUCTOR_17MM15_17MM15-MFG 2179.55,2176.98 r0 top value=10uH
L2 "CMLB135T-100MS" FP-CMLB135T-100MS_SMT2_13MM45_12Mm6-MFG 2150.02,1828.8 r0 top value=10uH
LBL1 "THT-14-423-10" Label_650x200 4054,3163 r0 top
LOGO1 "DANGER HIGH VOLTAGE" IEC_HighVoltage_Small 2850.75,132 r0 top
LOGO2 "CAUTION HOT SURFACE" IEC_HotSurface_Medium 4034,1604 r90 top
LOGO3 "CAUTION.  READ USER GUIDE BEFORE USE" IEC_Caution_Medium 2323.26,3029.05 r180 bottom
LOGO5 "CE Mark" CE_Mark_5mm 3250.1,679.21 r0 top
LOGO6 "FCC disclaimer" FCC_disclaimer 48,2215 r90 top
LOGO7 "WEEE logo" WEEE_Minimum 216.15,1709.77 r0 top
Q1 "SIR880BDP-T1-RE3" FP-SIR880BDP-T1-RE3_SO-8-MFG 1323.75,1856.14 r180 top
Q2 "SIR880BDP-T1-RE3" FP-SIR880BDP-T1-RE3_SO-8-MFG 1609.67,1889.99 r270 top
Q3 "SIR880BDP-T1-RE3" FP-SIR880BDP-T1-RE3_SO-8-MFG 3006.07,1825.8 r0 top
Q4 "SIR880BDP-T1-RE3" FP-SIR880BDP-T1-RE3_SO-8-MFG 2723.54,1967.26 r270 top
Q5 "AONS66917" FP-AONS66917_DFN8-MFG 675.79,3155.97 r270 top
Q6 "AONS66917" FP-AONS66917_DFN8-MFG 329,2964.54 r180 top
Q7 "AONS66917" FP-AONS66917_DFN8-MFG 3135.7,963.47 r180 top
Q8 "AONS66917" FP-AONS66917_DFN8-MFG 3187,1372.92 r0 top
R2 "WSL25125L000FEA" FP-WSL25125L000FEA_2512-MFG 610.82,1640.5 r0 top value=5m
R3 "CRCW06030000Z0EA" FP-CRCW06031R50FKEAHP_0603-MFG 2806.24,1703 r180 bottom value=0
R5 "CRCW060310R0FKEB" FP-CRCW060310R0FKEB_0603-MFG 1799.11,1176.27 r180 top value=10
R6 "CRCW060310R0FKEB" FP-CRCW060310R0FKEB_0603-MFG 1799.11,1247 r180 top value=10
R8 "CRCW06030000Z0EA" FP-CRCW06031R50FKEAHP_0603-MFG 1428.52,1946.44 r0 bottom value=0
R9 "CRCW06030000Z0EA" FP-CRCW06031R50FKEAHP_0603-MFG 2886.26,1201.2 r180 bottom value=0
R10 "CRCW120610R0FKEAHP" FP-CRCW120610R0FKEAHP_1206-MFG 1251.82,3225.42 r180 bottom value=10
R12 "CRCW06030000Z0EA" FP-CRCW06031R50FKEAHP_0603-MFG 597.22,2918 r90 bottom value=0
R13 "CRCW06030000Z0EA" FP-CRCW06031R50FKEAHP_0603-MFG 2028.2,1355.69 r90 top value=0
R14 "CRCW12103R30FKEAHP" 1210 1974,1949 r180 bottom value=3.30
R15 "CRCW12103R30FKEAHP" 1210 2465.59,2029.09 r270 bottom value=3.30
R17 "CRCW06030000Z0EA" FP-CRCW06031R50FKEAHP_0603-MFG 2619.97,2061.1 r0 bottom value=0
R20 "CRCW06030000Z0EA" FP-CRCW06031R50FKEAHP_0603-MFG 1449.97,2089.55 r0 bottom value=0
R21 "CRCW08051M00FKEAC" 0805_HV 1619.96,912.07 r0 top value=1.00Meg
R22 "CRCW060310R0FKEB" FP-CRCW060310R0FKEB_0603-MFG 2519.15,1147.83 r180 top value=10
R23 "CRCW06030000Z0EA" FP-CRCW06031R50FKEAHP_0603-MFG 2371.89,1305.62 r0 top value=0
R24 "FCSL110R005FER" FP-FCSL110R005FER_WIDE_4320-MFG 3549.04,1577.28 r180 top value=5m
R25 "CRCW060310R0FKEB" FP-CRCW060310R0FKEB_0603-MFG 2520.68,1069.88 r180 top value=10
R27 "ERJ-6ENF1333V" 0805_HV 1487.48,801.19 r90 top value=133k
R28 "ERJ-PB6B2493V" 0805_HV 2707.04,1098.12 r90 top value=249k
R30 "ERJ-6ENF2552V" 0805_HV 1619.96,790.63 r180 top value=25.5k
R32 "ERJ-6ENF3001V" 0805_HV 2522.5,1330 r180 top value=3.00k
R34 "RC0603FR-075K23L" 0603 1959.43,516.82 r270 top value=5.23k
R36 "CRCW0603133KFKEA" 0603 1982.27,801.19 r90 top value=133k
R41 "RC0603FR-0710KL" 0603 2105.73,483.1 r180 top value=10.0k
R45 "CRCW08050000Z0EA" FP-CRCW080510R0JNEAHP_0805-MFG 1515.37,1252.02 r180 top value=0
R46 "CRCW121020R0FKEAHP" FP-CRCW12104R30FKEAHP_1210-MFG 96.65,367.5 r270 bottom value=20
R48 "RC0603FR-07499KL" 0603 501.51,322.88 r90 bottom value=499k
R49 "CR0603-FX-3163ELF" FP-CR0603-FX-3163ELF_0603-MFG 472.11,190.18 r90 bottom value=316k
R50 "RC0603FR-072K21L" 0603 3906.05,429 r0 top value=2.21k
R51 "RC0603FR-072K21L" 0603 3924.56,685.1 r90 top value=2.21k
R52 "RC0603FR-072K21L" 0603 3924,832 r90 top value=2.21k
R53 "RC0603FR-0710KL" 0603 4149,371 r180 top value=10.0k
R54 "RC0603FR-0710KL" 0603 4318.71,371 r180 top value=10.0k
R55 "RC0603FR-0710KL" 0603 3886,340 r0 top value=10.0k
R56 "RC0603FR-0710KL" 0603 3899,948 r0 top value=10.0k
R59 "RC0805JR-070RL" 0805_HV 2780.2,1260.61 r90 top value=0
R64 "RG2012P-1372-B-T5" 0805_HV 2597.98,835.35 r90 top value=13.7k
R65 "RC0603FR-0730K1L" 0603 2024.57,598.23 r90 top value=30.1k
R66 "RC0603FR-072K49L" 0603 2331.76,949.96 r180 top value=2.49k
R67 "CRCW06034K99FKEAC" 0603 2201.54,833.94 r90 top value=4.99k
R68 "CRCW06030000Z0EA" FP-CRCW06031R50FKEAHP_0603-MFG 874.75,79.28 r135 bottom value=0
R69 "CRCW06030000Z0EA" FP-CRCW06031R50FKEAHP_0603-MFG 3774,50.37 r0 bottom value=0
R100 "CRCW06030000Z0EA" FP-CRCW06031R50FKEAHP_0603-MFG 1551.11,1079.92 r90 top value=0
R101 "CRCW06030000Z0EA" FP-CRCW06031R50FKEAHP_0603-MFG 1615.29,1016.24 r90 top value=0
R120 "CRCW08050000Z0EA" FP-CRCW080510R0JNEAHP_0805-MFG 1769.13,1460.93 r180 top value=0
R151 "RC1210JR-07100KL" 1210 914,2784 r90 bottom value=100k
R152 "RC1210JR-07100KL" 1210 995.67,944.62 r0 bottom value=100k
R153 "RC1210JR-07100KL" 1210 995.67,782.97 r0 bottom value=100k
R154 "RC1210JR-07100KL" 1210 902.53,1132.39 r90 bottom value=100k
R160 "CRCW06030000Z0EA" FP-CRCW06031R50FKEAHP_0603-MFG 1631.64,1557.58 r180 top value=0
R200 "RC0603JR-071K8L" 0603 2502.47,859.69 r90 top value=1.8k
R201 "RC0603JR-071K8L" 0603 2274.6,833.94 r90 top value=1.8k
R300 "CRCW08051R50FKEAHP" FP-CRCW080510R0JNEAHP_0805-MFG 1356.46,1422.55 r90 top value=1.5
R400 "RC1210JR-07100KL" 1210 3595.35,2763.97 r90 bottom value=100k
R401 "RC1210JR-07100KL" 1210 3427.43,2763.97 r90 bottom value=100k
R1000 "JR0805X35E" FP-JR0805X35E_0805-MFG 596.39,2957 r180 top value=0
R1001 "JR0805X35E" FP-JR0805X35E_0805-MFG 596.39,2876.5 r180 top value=0
R1002 "JR0805X35E" FP-JR0805X35E_0805-MFG 2942.71,1985.89 r0 top value=0
R1003 "JR0805X35E" FP-JR0805X35E_0805-MFG 2944.31,1972 r0 bottom value=0
R1004 "JR0805X35E" FP-JR0805X35E_0805-MFG 3395.91,1289.63 r270 top value=0
R1005 "JR0805X35E" FP-JR0805X35E_0805-MFG 3397,1291 r270 bottom value=0
SH-JP1 "SNT-100-BK-G" SNT-100-BK-G 1515,3590 r90 top value=1x2
SH-JP2 "SNT-100-BK-G" SNT-100-BK-G 1781,3577 r90 top value=1x2
SH-JP3 "SNT-100-BK-G" SNT-100-BK-G 1426.37,3917.26 r90 top value=1x2
SH-JP4 "SNT-100-BK-G" SNT-100-BK-G 1711.8,3917.26 r90 top value=1x2
SH-JP5 "SNT-100-BK-G" SNT-100-BK-G 2007.07,3917.26 r90 top value=1x2
SH-JP6 "SNT-100-BK-G" SNT-100-BK-G 2292.51,3917.26 r90 top value=1x2
SH-JP7 "SNT-100-BK-G" SNT-100-BK-G 2587.78,3917.26 r90 top value=1x2
SH-JP8 "SNT-100-BK-G" SNT-100-BK-G 2873.21,3917.26 r90 top value=1x2
SH-JP9 "SNT-100-BK-G" SNT-100-BK-G 3168.49,3917.26 r90 top value=1x2
SH-JP10 "SNT-100-BK-G" SNT-100-BK-G 3453.92,3917.26 r90 top value=1x2
SH-JP11 "SNT-100-BK-G" SNT-100-BK-G 3778.72,3917.26 r90 top value=1x2
TP1 "5002" Keystone5002 1631.64,367.5 r90 top
TP2 "5002" Keystone5002 1273.45,932.59 r90 top
TP3 "5002" Keystone5002 3475.28,3183.07 r90 top
TP4 "5002" Keystone5002 717.06,2793.63 r90 top
TP5 "5002" Keystone5002 2945.3,1285.99 r90 top
TP6 "5002" Keystone5002 3478.82,980.4 r90 top
TP7 "5002" Keystone5002 2502.47,463.57 r90 top
TP8 "5002" Keystone5002 2401.38,367.5 r90 top
TP9 "5002" Keystone5002 3699.5,948 r0 top
TP10 "5002" Keystone5002 1279.4,1296.53 r90 top
TP11 "5002" Keystone5002 1617.5,1387.5 r90 top
TP12 "5002" Keystone5002 1314.24,792.25 r90 top
TP13 "5002" Keystone5002 1428.34,635.59 r90 top
TP14 "5002" Keystone5002 1596.8,645.13 r90 top
TP15 "5002" Keystone5002 1221.64,1426.18 r90 top
TP16 "5002" Keystone5002 1617.5,506.86 r90 top
TP17 "5002" Keystone5002 2274.6,433.15 r90 top
TP18 "5002" Keystone5002 2051.01,2637 r90 top
TP19 "5002" Keystone5002 2257.14,2637 r90 top
TP20 "5002" Keystone5002 2698.25,1572.84 r90 top
TP21 "5002" Keystone5002 3733,1088 r180 top
TP22 "5002" Keystone5002 2612.07,1452.92 r90 top
TP23 "5002" Keystone5002 2758.79,1452.92 r90 top
TP24 "5002" Keystone5002 2790.6,645.13 r90 top
TP25 "5002" Keystone5002 1331.21,1597.65 r90 top
TP26 "5002" Keystone5002 1349.61,1064.95 r90 top
TP27 "5002" Keystone5002 2900.2,1418.18 r90 top
TP28 "5002" Keystone5002 2515.4,1546.68 r90 top
TP29 "5002" Keystone5002 3699.5,664.6 r0 top
TP30 "5002" Keystone5002 3675,132 r180 top
TP31 "5002" Keystone5002 3698,800.5 r0 top
TP32 "5002" Keystone5002 576,89 r90 top
TP33 "5002" Keystone5002 3938.26,1085.1 r90 top
TP34 "5002" Keystone5002 3940,1237 r90 top
TP35 "5016" Testpoint_Keystone_Compact 1460.8,417.75 r90 top
TP36 "5016" Testpoint_Keystone_Compact 148,344 r0 top
TP37 "5016" Testpoint_Keystone_Compact 2387,2992 r0 top
TP38 "5016" Testpoint_Keystone_Compact 3666.9,318.08 r90 top
TP39 "5016" Testpoint_Keystone_Compact 2752,433.15 r0 top
TP40 "5016" Testpoint_Keystone_Compact 1938,2992 r180 top
TP41 "5002" Keystone5002 2872.64,1593.12 r90 top
TP42 "5002" Keystone5002 2616.61,644.7 r0 top
TP43 "5002" Keystone5002 1818,2605.19 r90 top
TP44 "5002" Keystone5002 2499.14,2605.19 r90 top
TP45 "5002" Keystone5002 119,2956 r90 top
TP46 "5002" Keystone5002 653,1390.18 r90 top
TP47 "5016" Testpoint_Keystone_Compact 153.66,131 r0 top
U1 "BQ25750RRVT" RRV0036A-MFG 2150.02,1115.24 r90 top locked
U2 "LT3010EMS8E#PBF" FP-LT3010EMS8E-PBF_MSOP8-MFG 327.62,303.79 r180 bottom
ZZ1 "These assemblies are ESD sensitive, ESD precautions shall be observed." AssemblyNote 536,4863 r0 top
ZZ2 "These assemblies must be clean and free from flux and all contaminants. Use of no clean flux is not acceptable." AssemblyNote 532,4727 r0 top
ZZ3 "These assemblies must comply with workmanship standards IPC-A-610 Class 2, unless otherwise specified." AssemblyNote 526,4590 r0 top
ZZ4 "Install label in silkscreened box after final wash.  Text shall be 8 pt font.  Text shall be per the Label Table in the PDF schematic." AssemblyNote 524,4464 r0 top
ZZ5 "For BQ25750 variant, Install JP1, JP4, JP5, JP6, JP9, JP10, pin 1-2 of JP12, JP13, JP14, JP15, and JP16" AssemblyNote 524,4346 r0 top
ZZ6 "For BQ25758 variant, Install JP4, JP5, JP6, JP9, JP10, pin 1-2 of JP12, JP13, JP14, JP15, and JP16" AssemblyNote 521,4223 r0 top
ZZ7 "For BQ25756 variant, Install JP1, JP4, JP5, JP6, JP9, JP10, pin 1-2 of JP12, JP13, JP14, JP15, and JP16" AssemblyNote 518,4119 r0 top

## Footprints (in the part's own frame and the unit in brackets; to place one, negate y for a bottom-side part, rotate by r counter-clockwise, add the part's x,y. Pads: shape width x height; smd on the part's side, far side on the other; paste and mask are expansions set on the pad)
0603 [mm] "0603 from SM-752 data"
  rect 1x0.95 smd: 1(-0.8,0) 2(0.8,0)
  silkscreen extent -1.52,-0.69 1.52,0.69, body extent -0.87,-0.47 0.87,0.47, height 1
0603_HV [mil] "Ernesto recommended land pattern.  26 mil between pads."
  rect 30x30 smd: 1(-28,0) 2(28,0)
  silkscreen extent -52,-24 52,24, body extent -34,-19 34,19, height 39
0603L [mm] "0603 from SM-752 data"
  rect 0.8x0.85 smd: 1(-0.7,0) 2(0.7,0)
  silkscreen extent -0.07,-0.33 0.07,0.33, body extent -0.87,-0.47 0.87,0.47, height 1
0805_150 [mm] "0805 / 1.5 mm height"
  rect 1.15x1.45 smd: 1(-0.9,0) 2(0.9,0)
  silkscreen extent -0.1,-0.8 0.1,0.8, body extent -1.1,-0.72 1.1,0.72, height 1.5
0805_HV [mil] "0805 with 30mil clearance between pads"
  rect 50x63 smd: 1(-40,0) 2(40,0)
  silkscreen extent -74,-40 74,40, body extent -43,-29 43,29, height 57
1210 [mm] "1210 from SM-752 data"
  rect 1.3x2.7 smd: 1(-1.45,0) 2(1.45,0)
  silkscreen extent -2.32,-1.57 2.32,1.57, body extent -1.7,-1.35 1.7,1.35, height 1.35
AssemblyNote [mil] "Assembly Note"
Bumpon_SJ5003Transparent [mil] "3M Hemispherical Bumpon transparent"
  round 1 on Mech4: 0(0,0)
  silkscreen extent -228,-228 228,228, body extent -219,-219 219,219, height 197
CE_Mark_5mm [mil] "Minimum text height for CE Mark"
  silkscreen extent -138,-98 138,98
CONN_22-05-3041 [mm] "MOLEX"
  rect 1.65x1.65 hole 1.02: 1(-3.81,5.7)
  round 1.65 hole 1.02: 2(-1.27,5.7) 3(1.27,5.7) 4(3.81,5.7)
  silkscreen extent -5,0 5,4.18, body extent -5,-6.91 5,6.02, height 6.37
CONN_2510-6002 [mm] "3M 2500 series TS-0770-L December 15, 2011"
  rect 1.65x1.65 hole 1.016 mask+0: 1(-5.08,-1.27)
  round 1.65 hole 1.016 mask+0: 2(-5.08,1.27) 3(-2.54,-1.27) 4(-2.54,1.27) 5(0,-1.27) 6(0,1.27) 7(2.54,-1.27) 8(2.54,1.27) 9(5.08,-1.27) 10(5.08,1.27)
  silkscreen extent -10.01,-4.17 10.01,4.47, body extent -10.01,-4.11 10.01,4.52, height 9.92
CONN_PEC02SAAN [mm] "SULLINS"
  rrect7% 1.5x1.5 hole 1.016: 1(-1.27,0)
  round 1.5 hole 1.016: 2(1.27,0)
  silkscreen extent -2.54,-1.52 2.54,1.27, body extent -2.54,-1.27 2.54,1.27, height 8.38
CONN_PEC03SAAN [mm] "SULLINS"
  rect 1.5x1.5 hole 1.016: 1(-2.54,0)
  round 1.5 hole 1.016: 2(0,0) 3(2.54,0)
  silkscreen extent -4.72,-1.27 3.81,1.27, body extent -3.84,-1.3 3.84,1.3, height 8.38
FCC_disclaimer [mil]
Fiducial10-20 [mm]
  round 1 smd mask+0.5: 1(0,0)
  Top Layer keep-out circle w1.178: c0,0 r0.5
FP-100SXV22M_RADIAL-MFG [mm]
  rrect5% 4.4x1.9 smd paste+0 mask+0: 1(-4.35,0) 2(4.35,0)
  silkscreen extent -7.23,-5.25 5.25,5.25, body extent -6.8,-5.5 6.8,5.5, height 0.25
FP-12101C105KAT2A_1210-MFG [mm]
  rrect10% 1x2.5 smd paste+0 mask+0: 1(-1.5,0) 2(1.5,0)
  silkscreen extent -0.62,-1.4 0.62,1.4, body extent -1.65,-1.25 1.65,1.25, height 2.79
FP-109159005101916_CONN_SSL_PLUG5-MFG [mm]
  rrect8% 1.2x2 smd paste+0 mask+0: 1(6,-2.3) 2(3,-2.3) 3(0,-2.3) 4(-3,-2.3) 5(-6,-2.3)
  rrect7% 1.5x1.6 smd paste+0 mask+0: 6(-8.435,-1.35) 7(8.435,-1.35)
  silkscreen extent -8.5,-3.97 8.5,-2.52, body extent -9.29,-3.4 9.29,2.7, height 0.25
FP-AONS66917_DFN8-MFG [mm]
  rrect20% 0.5x0.65 smd paste+0 mask+0: 1(-1.905,-2.755) 2(-0.635,-2.755) 3(0.635,-2.755) 4(1.905,-2.755)
  round 3.687 smd paste+0 mask+0: 5-6-7-8(-0.036,0.448)
  Top Layer region: -2.3,-1.6 2.3,-1.6 2.3,2.52 2.155,2.52 2.155,3.07 1.655,3.07 1.655,2.52 0.885,2.52 0.885,3.07 0.385,3.07 0.385,2.52 -0.385,2.52 -0.385,3.07 -0.885,3.07 -0.885,2.52 -1.655,2.52 -1.655,3.07 -2.155,3.07 -2.155,2.52 -2.3,2.52
  silkscreen extent -3,-3.77 3,2.6, body extent -2.9,-3.18 2.9,3.17, height 0.25
FP-C3225X7R2A106K250AC_1210-MFG [mm]
  rrect9% 1.1x2.2 smd paste+0 mask+0: 1(-1.65,0) 2(1.65,0)
  silkscreen extent -0.72,-1.43 0.72,1.43, body extent -1.6,-1.25 1.6,1.25, height 2.85
FP-CGA4J1X7R1E475K125AE_0805-MFG [mm]
  rrect13% 0.8x1.05 smd paste+0 mask+0: 1(-0.925,0) 2(0.925,0)
  silkscreen extent -0.15,-0.72 0.15,0.72, body extent -1.43,-0.82 1.43,0.82, height 0.25
FP-CGA6N3X7R2A225K230AE_1210-MFG [mm]
  rrect9% 1.1x2.2 smd paste+0 mask+0: 1(-1.65,0) 2(1.65,0)
  body extent -1.6,-1.25 1.6,1.25, height 2.3
FP-CMLB135T-100MS_SMT2_13MM45_12Mm6-MFG [mm]
  rrect3% 3.25x5 smd paste+0 mask+0: 1(-5.625,0) 2(5.625,0)
  silkscreen extent -6.9,-6.4 6.9,6.4, body extent -7.35,-6.5 7.35,6.5, height 0.25
FP-CR0603-FX-3163ELF_0603-MFG [mm]
  rrect15% 0.65x0.9 smd paste+0 mask+0: 1(-0.725,0) 2(0.725,0)
  silkscreen extent 0,-0.45 0,0.45, body extent -0.8,-0.4 0.8,0.4, height 0.55
FP-CRCW06031R50FKEAHP_0603-MFG [mm]
  rrect13% 0.75x1 smd paste+0 mask+0: 1(-0.75,0) 2(0.75,0)
  silkscreen extent -0.8,-0.9 0.8,0.9, body extent -0.8,-0.43 0.8,0.43, height 0.55
FP-CRCW12104R30FKEAHP_1210-MFG [mm]
  rrect9% 1.1x2.8 smd paste+0 mask+0: 1(-1.4,0) 2(1.4,0)
  silkscreen extent -0.48,-1.35 0.48,1.35, body extent -1.6,-1.25 1.6,1.25, height 0.7
FP-CRCW060310R0FKEB_0603-MFG [mm]
  rrect13% 0.75x1 smd paste+0 mask+0: 1(-0.75,0) 2(0.75,0)
  silkscreen extent -0.8,-0.9 0.8,0.9, body extent -1.22,-0.6 1.22,0.6, height 0.25
FP-CRCW080510R0JNEAHP_0805-MFG [mm]
  rrect11% 0.95x1.45 smd paste+0 mask+0: 1(-0.975,0) 2(0.975,0)
  silkscreen extent -0.13,-0.7 0.13,0.7, body extent -1.55,-0.82 1.55,0.82, height 0.25
FP-CRCW120610R0FKEAHP_1206-MFG [mm]
  rrect10% 1.05x1.8 smd paste+0 mask+0: 1(-1.275,0) 2(1.275,0)
  silkscreen extent -0.38,-0.87 0.38,0.87, body extent -1.55,-0.8 1.55,0.8, height 0.65
FP-FCSL110R005FER_WIDE_4320-MFG [mm]
  rrect10% 1x11.2 smd paste+0 mask+0: 1(-2.3,0) 2(2.3,0)
  silkscreen extent -1.43,-5.6 1.43,5.6, body extent -2.5,-5.5 2.5,5.5, height 0.7
FP-GCJ32DC72A475KE01L_1210-MFG [mm]
  rrect9% 1.1x2.05 smd paste+0 mask+0: 1(-1.65,0) 2(1.65,0)
  silkscreen extent -1.8,-1.4 1.8,1.4, body extent -1.6,-1.25 1.6,1.25, height 2.3
FP-IHLP6767GZER100M01_SMT_INDUCTOR_17MM15_17MM15-MFG [mm]
  rrect3% 3.825x12.32 smd paste+0 mask+0: 1(-8.117,0) 2(8.117,0)
  silkscreen extent -8.64,-8.57 8.64,8.57, body extent -10.13,-8.67 10.13,8.67, height 0.25
FP-JR0805X35E_0805-MFG [mm]
  rrect7% 1.4x1.44 smd paste+0 mask+0: 1(-1.1,0) 2(1.1,0)
  silkscreen extent 0,-0.72 0,0.72, body extent -1.9,-0.82 1.9,0.82, height 0.25
FP-LT3010EMS8E-PBF_MSOP8-MFG [mm]
  rrect24% 0.889x0.42 smd paste+0 mask+0: 1(-2.105,0.975) 2(-2.105,0.325) 3(-2.105,-0.325) 4(-2.105,-0.975) 5(2.105,-0.975) 6(2.105,-0.325) 7(2.105,0.325) 8(2.105,0.975)
  rrect6% 1.68x1.88 smd paste+0 mask+0: 9(0,0)
  silkscreen extent -3.27,-1.55 1.55,1.55, body extent -2.47,-1.5 2.47,1.5, height 1.1
FP-SIR880BDP-T1-RE3_SO-8-MFG [mil]
  rrect16% 50x24 smd paste+0 mask+0: 1(-105,75) 2(-105,25) 3(-105,-25) 4(-105,-75)
  round 132.13 smd paste+0 mask+0: 5-6-7-8(25.41,2.72)
  Top Layer region: -48,77 90,77 90,87 130,87 130,63 102,63 102,37 130,37 130,13 102,13 102,-13 130,-13 130,-37 102,-37 102,-63 130,-63 130,-87 90,-87 90,-77 -48,-77
  silkscreen extent -157,-110 118,110, body extent -134,-107 134,107, height 10
FP-SZBZX84C15LT3G_SOT23-MFG [mm]
  rrect13% 0.9x0.8 smd paste+0 mask+0: 1(-1,0.95) 2(-1,-0.95) 3(1,0)
  silkscreen extent -0.7,-1.52 0.7,1.52, body extent -1.2,-1.45 1.2,1.45, height 1.11
FP-T521X156M075ATE035_2917-MFG [mm]
  rrect5% 1.99x2.33 smd paste+0 mask+0: 1(-3.01,0) 2(3.01,0)
  silkscreen extent -3.8,-2.3 4.9,2.3, body extent -4.13,-2.42 4.13,2.42, height 0.25
FP-TB005-762-02BE_TERM_CONN-MFG [mm]
  rrect4% 2.45x2.45 hole 1.6 paste-1000 mask+0: 1(-3.51,1.6)
  round 2.45 hole 1.6 paste-1000 mask+0: 2(4.11,1.6)
  silkscreen extent -8.83,-6.5 8.25,6.5, body extent -8.34,-6.6 8.34,6.6, height 0.25
FP-V1FM10-M3-H_DO-219AB-MFG [mm]
  rrect8% 1.3x1.4 smd paste+0 mask+0: 1(1.45,0) 2(-1.45,0)
  silkscreen extent -0.43,-0.95 2.79,0.95, body extent -2.2,-1.05 2.2,1.05, height 0.25
FP-VS-1EMH01HM3_5AT_DO-214AC-MFG [mm]
  rrect6% 1.7x1.68 smd paste+0 mask+0: 1(-1.79,0) 2(1.79,0)
  silkscreen extent -3.37,-1.4 2.25,1.4, body extent -2.55,-1.33 2.55,1.33, height 2.29
FP-WSL25125L000FEA_2512-MFG [mm]
  rrect5% 2.11x3.68 smd paste+0 mask+0: 1(-2.645,0) 2(2.645,0)
  silkscreen extent -1.21,-1.72 1.21,1.72, body extent -3.8,-1.94 3.8,1.94, height 0.25
IEC_Caution_Medium [mil]
  silkscreen extent -217,-183 217,193
IEC_HighVoltage_Small [mil]
  silkscreen extent -107,-88 107,97
IEC_HotSurface_Medium [mil]
  silkscreen extent -217,-188 217,188
Keystone5002 [mil] "For Keystone 500x miniature loop terminals"
  round 80 hole 40: 1(0,0)
  silkscreen extent -52,-52 52,52, body extent -49,-49 49,49, height 182
Label_650x200 [mil] "Thermal Transfer Label"
  round 1 on Mech13: 0(0,0)
  silkscreen extent -325,-100 325,100, body extent -325,-100 325,100, height 1
MOLEX_39357-0002 [mm] "Terminal Block, 3.5 mm, 2x1, TH"
  rect 1.6x1.6 hole 1.1: 1(-1.75,0)
  round 1.6 hole 1.1: 2(1.75,0)
  silkscreen extent -3.86,-3.45 3.5,3.84, body extent -3.55,-3.45 3.56,3.84, height 8.51
RRV0036A-MFG [mm]
  rrect40% 0.6x0.25 smd paste+0 mask+0: 1(-2.4,2.25) 2(-2.4,1.75) 3(-2.4,1.25) 4(-2.4,0.75) 5(-2.4,0.25) 6(-2.4,-0.25) 7(-2.4,-0.75) 8(-2.4,-1.25) 9(-2.4,-1.75) 10(-2.4,-2.25) 19(2.4,-2.25) 20(2.4,-1.75) 21(2.4,-1.25) 22(2.4,-0.75) 23(2.4,-0.25) 24(2.4,0.25) 25(2.4,0.75) 26(2.4,1.25) 27(2.4,1.75) 28(2.4,2.25)
  rrect40% 0.25x0.6 smd paste+0 mask+0: 11(-1.75,-2.9) 12(-1.25,-2.9) 13(-0.75,-2.9) 14(-0.25,-2.9) 15(0.25,-2.9) 16(0.75,-2.9) 17(1.25,-2.9) 18(1.75,-2.9) 29(1.75,2.9) 30(1.25,2.9) 31(0.75,2.9) 32(0.25,2.9) 33(-0.25,2.9) 34(-0.75,2.9) 35(-1.25,2.9) 36(-1.75,2.9)
  rrect3% 3.6x4.6 smd paste-1000 mask+0: 37(0,0)
  silkscreen extent -3.4,-3.05 2.55,3.05, body extent -2.8,-3.3 2.8,3.3, height 0.25
SNT-100-BK-G [mil] "Samtec STEP model"
  round 1 on Mech3: 0(0,0)
  body extent -100,-50 100,50, height 344
Testpoint_Keystone_Compact [mil] "Compact SMT test point"
  rect 185x135 smd: 1(0,0)
  silkscreen extent -110,-80 110,80, body extent -75,-56 75,56, height 91
TO-277A [mm] "Vishay"
  rect 1.4x1.27 smd: 1(-1.04,1.83) 2(1.04,1.83)
  rect 4.72x4.8 smd: 3(0,-1.883)
  silkscreen extent -2.7,1.45 -2.4,1.75, body extent -2.35,-4.2 2.4,2.45, height 1.2
TSW-104-07-G-D [mm] "Samtec 100mil, 2x4, 230 mil above insulator"
  rrect6% 1.65x1.65 hole 1.016: 1(-3.81,-1.27)
  round 1.65 hole 1.016: 2(-3.81,1.27) 3(-1.27,-1.27) 4(-1.27,1.27) 5(1.27,-1.27) 6(1.27,1.27) 7(3.81,-1.27) 8(3.81,1.27)
  silkscreen extent -6.1,-2.54 5.08,2.54, body extent -5.08,-2.54 5.08,2.54, height 8.38
WEEE_Minimum [mil] "WEEElie bin"
  silkscreen extent -95,-172 99,104
WL-SMCW_GREEN [mm] "WURTH"
  rect 0.8x0.8 smd: 1(-0.8,0) 2(0.8,0)
  silkscreen extent -1.9,-0.8 1.2,0.8, body extent -0.85,-0.45 0.85,0.45, height 0.8

## Part data
C2 C3 C5 C8 C28 C40 C45 C54 C60: library part CMP-0093675-1, "4.7uF ±10% 100V Ceramic Capacitor X7S 1210 (3225 Metric)", Manufacturer=Murata, Operating Temperature Range="-55°C to +125°C", TempCo=22%, Temperature Characteristic=X7S, Tolerance_%=10%, ValueDisplayed=4.7uF, AEC Grade="Grade 1", AEC Qualified=Yes, Cap_F=4.7µF, ComponentLink1Description=Datasheet, ComponentLink1URL=https://www.murata.com/en-us/products/productdetail?partno=GCJ32DC72A475KE01%23, datasheet=https://www.murata.com/en-us/products/productdetail?partno=GCJ32DC72A475KE01%23, Datasheet Path=datasheets/Cap-GCJ32DC72A475KE01L.pdf, helpURL=https://upverter.com/upn/revision/54580131a15fb126/, Lead Free=Yes, PackageReference=1210, Part Number=GCJ32DC72A475KE01L, PartNumber=GCJ32DC72A475KE01L, RoHS=TRUE, SizeZ_mm=2.3mm, VDC_V=100V
C4 C6 C29 C42 C46 C53 C56 C150: library part CMP-0096021-1, "10 µF ±10% 100V Ceramic Capacitor X7R 1210 (3225 Metric)", Digikey Part Number=445-C3225X7R2A106K250ACCT-ND, Manufacturer=TDK, Mouser Part Number=810-C3225X7R2A106K25, Operating Temperature Range="-55°C to +125°C", TempCo=15%, Temperature Characteristic=X7R, Tolerance_%=10%, ValueDisplayed=10uF, AEC Qualified=No, Cap_F=10µF, ComponentLink1Description=Datasheet, ComponentLink1URL=https://product.tdk.com/en/search/capacitor/ceramic/mlcc/info?part_no=C3225X7R2A106K250AC, datasheet=https://product.tdk.com/en/search/capacitor/ceramic/mlcc/info?part_no=C3225X7R2A106K250AC, Datasheet Path=datasheets/Cap-C3225X7R2A106K250AC.pdf, Digikey Description="COMMERCIAL GRADE GENERAL PURPOSE", helpURL=https://upverter.com/upn/revision/84742aafcccd6735/, Lead Free=Yes, Mouser Description="Multilayer Ceramic Chip Capacitors, Capacitance=10µF, LxWxT: 3.2x2.5x2.5mm", PackageReference=1210, Part Number=C3225X7R2A106K250AC, PartNumber=C3225X7R2A106K250AC, RoHS=TRUE, SizeZ_mm=2.85mm, Supplier 1=Digikey, Supplier 2=Mouser, Supplier Part Number 1=445-C3225X7R2A106K250ACCT-ND, Supplier Part Number 2=810-C3225X7R2A106K25, VDC_V=100V
C7 C38 C39 C44 C57 C70: library part CMP-0095409-1, "Aluminum Organic Polymer Capacitors 80VDC 47uF 20% SMD 980mA Halogen Free", Digikey Part Number=P122446CT-ND, Leakage Current=110uA, Manufacturer=Panasonic, Mouser Part Number=667-100SXV22M, Operating Temperature Range="-55°C to +125°C", Tolerance_%=20%, ValueDisplayed=47uF, AEC Qualified=No, Cap_F=47uF, ComponentLink1Description=Datasheet, ComponentLink1URL=https://industrial.panasonic.com/cdbs/www-data/pdf/AAB8000/AAB8000C259.pdf, datasheet=https://industrial.panasonic.com/cdbs/www-data/pdf/AAB8000/AAB8000C259.pdf, Datasheet Path=datasheets/Cap-100SXV22M.pdf, Digikey Description="CAP ALUM POLY 22UF 20% 100V SMD", Dissipation Factor=12%, Esr=30m, helpURL=https://upverter.com/upn/revision/e7b539325109d3d2/, IRMS_A=940mA, Lead Free=Yes, Life=1000Hours, PackageReference=SMT, Part Number=80SXV47M, PartNumber=80SXV47M, RoHS=TRUE, SizeZ_mm=12.7mm, Supplier 1=Digikey, Supplier 2=Mouser, Supplier Part Number 1=P122446CT-ND, Supplier Part Number 2=667-100SXV22M, VDC_V=80V
C9 C36: library part CMP-0006845-4, "CAP, CERM, 1000 pF, 50 V, +/- 5%, X7R, 0603", Cap_Case=0603, Manufacturer=Kemet, Supplier Part Number 1=399-1083-1-ND, TempCo=X7R, Tolerance_%=5%, Value1=Unknown, Value2=50V, ValueDisplayed=1000pF, AEC Category=Q200, AEC Qualified=?, Cap_F=1nF, ComponentLink1Description="Datasheet link", ComponentLink1URL=http://www.kemet.com/kemet/web/homepage/kechome.nsf/vapubfiles/F3102_Y5V.pdf/$file/F3102_Y5V.pdf, CompType=Capacitor, LatestRevisionDate=2017-03-09, MountType=SMT, PackageReference=0603, PartNumber=C0603C102J5RACTU, Polarized=N, Published=2008-06-19, Publisher="Texas Instruments", RoHS=Y, SizeArea_mm2=1.28, SizeAreaWB_mm2=4.68, SizeX_mm=1.6, SizeY_mm=0.8, SizeZ_mm=1, Supplier 1=Digi-Key, Supplier 2=Mouser, Supplier 3=Farnell, Supplier Part Number 2=80-C0603C102J5R, Supplier Part Number 3=8770948, TaMax_C=125°C, TaMin_C=-55°C, Technology=Ceramic, U/M=EA, VDC_V=50V
C10 C11 C17 C19 C20 C21 C23 C24 C32 C63 C80 C200: library part CMP-0081011-1, "CAP, CERM, 0.1 µF, 100 V,+/- 10%, X7R, AEC-Q200 Grade 1, 0603", Cap_Case=0603, Manufacturer="Taiyo Yuden", Supplier Part Number 1=587-6009-1-ND, TempCo=X7R, Tolerance_%=10%, Value2=100V, ValueDisplayed=0.1µF, AEC Category=Q200, AEC Grade=1, AEC Qualified=Y, Cap_F=100nF, ComponentLink1Description="Datasheet link", ComponentLink1URL=http://ds.yuden.co.jp/TYCOMPAS/ut/detail.do?productNo=HMK107B7104KAHT&fileName=HMK107B7104KAHT_SS&mode=specSheetDownload, CompType=Capacitor, MountType=SMT, PackageReference=0603, PartNumber=HMK107B7104KAHT, Polarized=N, RoHS=Y, SizeArea_mm2=1.28, SizeAreaWB_mm2=4.68, SizeX_mm=1.6, SizeY_mm=0.8, SizeZ_mm=1, Supplier 1=Digi-Key, Supplier 2=Mouser, Supplier Part Number 2=963-HMK107B7104KAHT, TaMax_C=125°C, TaMin_C=-55°C, Technology=Ceramic, U/M=EA, VDC_V=100V
C12 C18: library part CMP-0006753-4, "CAP, CERM, 0.1 uF, 25 V, +/- 10%, X7R, 0603", Cap_Case=0603, Manufacturer=AVX, Supplier Part Number 1=478-3714-1-ND, TempCo=X7R, Tolerance_%=10%, Value1="0.05 ohm", Value2=25V, ValueDisplayed=0.1uF, AEC Category=Q200, AEC Grade=N/A, AEC Qualified=N, Cap_F=100nF, ComponentLink1Description="Datasheet link", ComponentLink1URL=http://datasheets.avx.com/X7RDielectric.pdf, CompType=Capacitor, ESR_ohm=50m, LatestRevisionDate=2017-03-09, MountType=SMT, PackageReference=0603, PartNumber=06033C104KAT2A, Polarized=N, Published=2008-06-19, Publisher="Texas Instruments", RoHS=Y, SizeArea_mm2=1.28, SizeAreaWB_mm2=4.68, SizeX_mm=1.6, SizeY_mm=0.8, SizeZ_mm=1, Supplier 1=Digi-Key, Supplier 2=Newark, Supplier 3=Mouser, Supplier Part Number 2=96M1263, Supplier Part Number 3=581-06033C104KAT2A, TaMax_C=125°C, TaMin_C=-55°C, Technology=Ceramic, U/M=EA, VDC_V=25V
C13: library part CMP-0087124-1, "Cap Ceramic 2.2uF 100V X7R 10% SMD 1210 FlexiTerm 125C Plastic T/R", Manufacturer="TDK Corporation", TempCo=15%, Tolerance_%=10%, AEC Grade="Grade 1", AEC Qualified=Yes, Cap_F=2.2µF, ComponentLink1Description=Datasheet, ComponentLink1URL=https://product.tdk.com/info/en/catalog/spec/mlccspec_automotive_soft_en.pdf, PackageReference=1210, PartNumber=CGA6N3X7R2A225K230AE, RoHS=TRUE, SizeZ_mm=2.6mm, Symbol Name=SYM-CGA6N3X7R2A225K230AE, VDC_V=100V
C14 C15: library part CMP-0006722-4, "CAP, CERM, 33 pF, 100 V, +/- 5%, C0G/NP0, 0603", Cap_Case=0603, Manufacturer=AVX, Supplier Part Number 1=478-1143-1-ND, TempCo=C0G/NP0, Tolerance_%=5%, Value1="0.209 ohm", Value2=100V, ValueDisplayed=33pF, AEC Category=Q200, AEC Grade=N/A, AEC Qualified=N, Cap_F=33pF, ComponentLink1Description="Datasheet link", ComponentLink1URL=http://datasheets.avx.com/C0GNP0-Dielectric.pdf, CompType=Capacitor, ESR_ohm=0.209, LatestRevisionDate=2017-03-09, MountType=SMT, PackageReference=0603, PartNumber=06031A330JAT2A, Polarized=N, Published=2008-06-19, Publisher="Texas Instruments", RoHS=Y, SizeArea_mm2=1.28, SizeAreaWB_mm2=4.68, SizeX_mm=1.6, SizeY_mm=0.8, SizeZ_mm=1, Supplier 1=Digi-Key, Supplier 2=Newark, Supplier 3=Mouser, Supplier Part Number 2=96M1221, Supplier Part Number 3=581-06031A330J, TaMax_C=125°C, TaMin_C=-55°C, Technology=Ceramic, U/M=EA, VDC_V=100V
C16 C74 C77 C78 C81 C82: library part CMP-0861070-1, "CAP, CERM, 1 µF, 100 V,+/- 10%, X7R, AEC-Q200 Grade 1, 0805", Cap_Case=0805, Manufacturer=AVX, TempCo=X7R, Tolerance_%=10%, Value2=100V, ValueDisplayed=1µF, AEC Category=Q200, AEC Grade=1, AEC Qualified=Y, Cap_F=1µF, ComponentLink1Description="Datasheet link", ComponentLink1URL=http://datasheets.avx.com/AutoMLCC.pdf, CompType=Capacitor, MountType=SMT, PackageReference=0805, PartNumber=08051C105K4Z2A, Polarized=N, RoHS=Y, SizeArea_mm2=2.5, SizeAreaWB_mm2=6.75, SizeX_mm=2, SizeY_mm=1.25, SizeZ_mm=1.5, TaMax_C=125°C, TaMin_C=-55°C, Technology=Ceramic, U/M=EA, VDC_V=100V